# Altium PCB ScreenerMobo.PcbDoc (part 1 of 5)
Units mm, origin at the board's own origin, x right, y up, seen from the top; angles counter-clockwise.
Board outline 145 x 180 mm, 2 copper layers (Top Layer, Bottom Layer); 434 components, 355 nets, 1806 pads, 3000 vias.
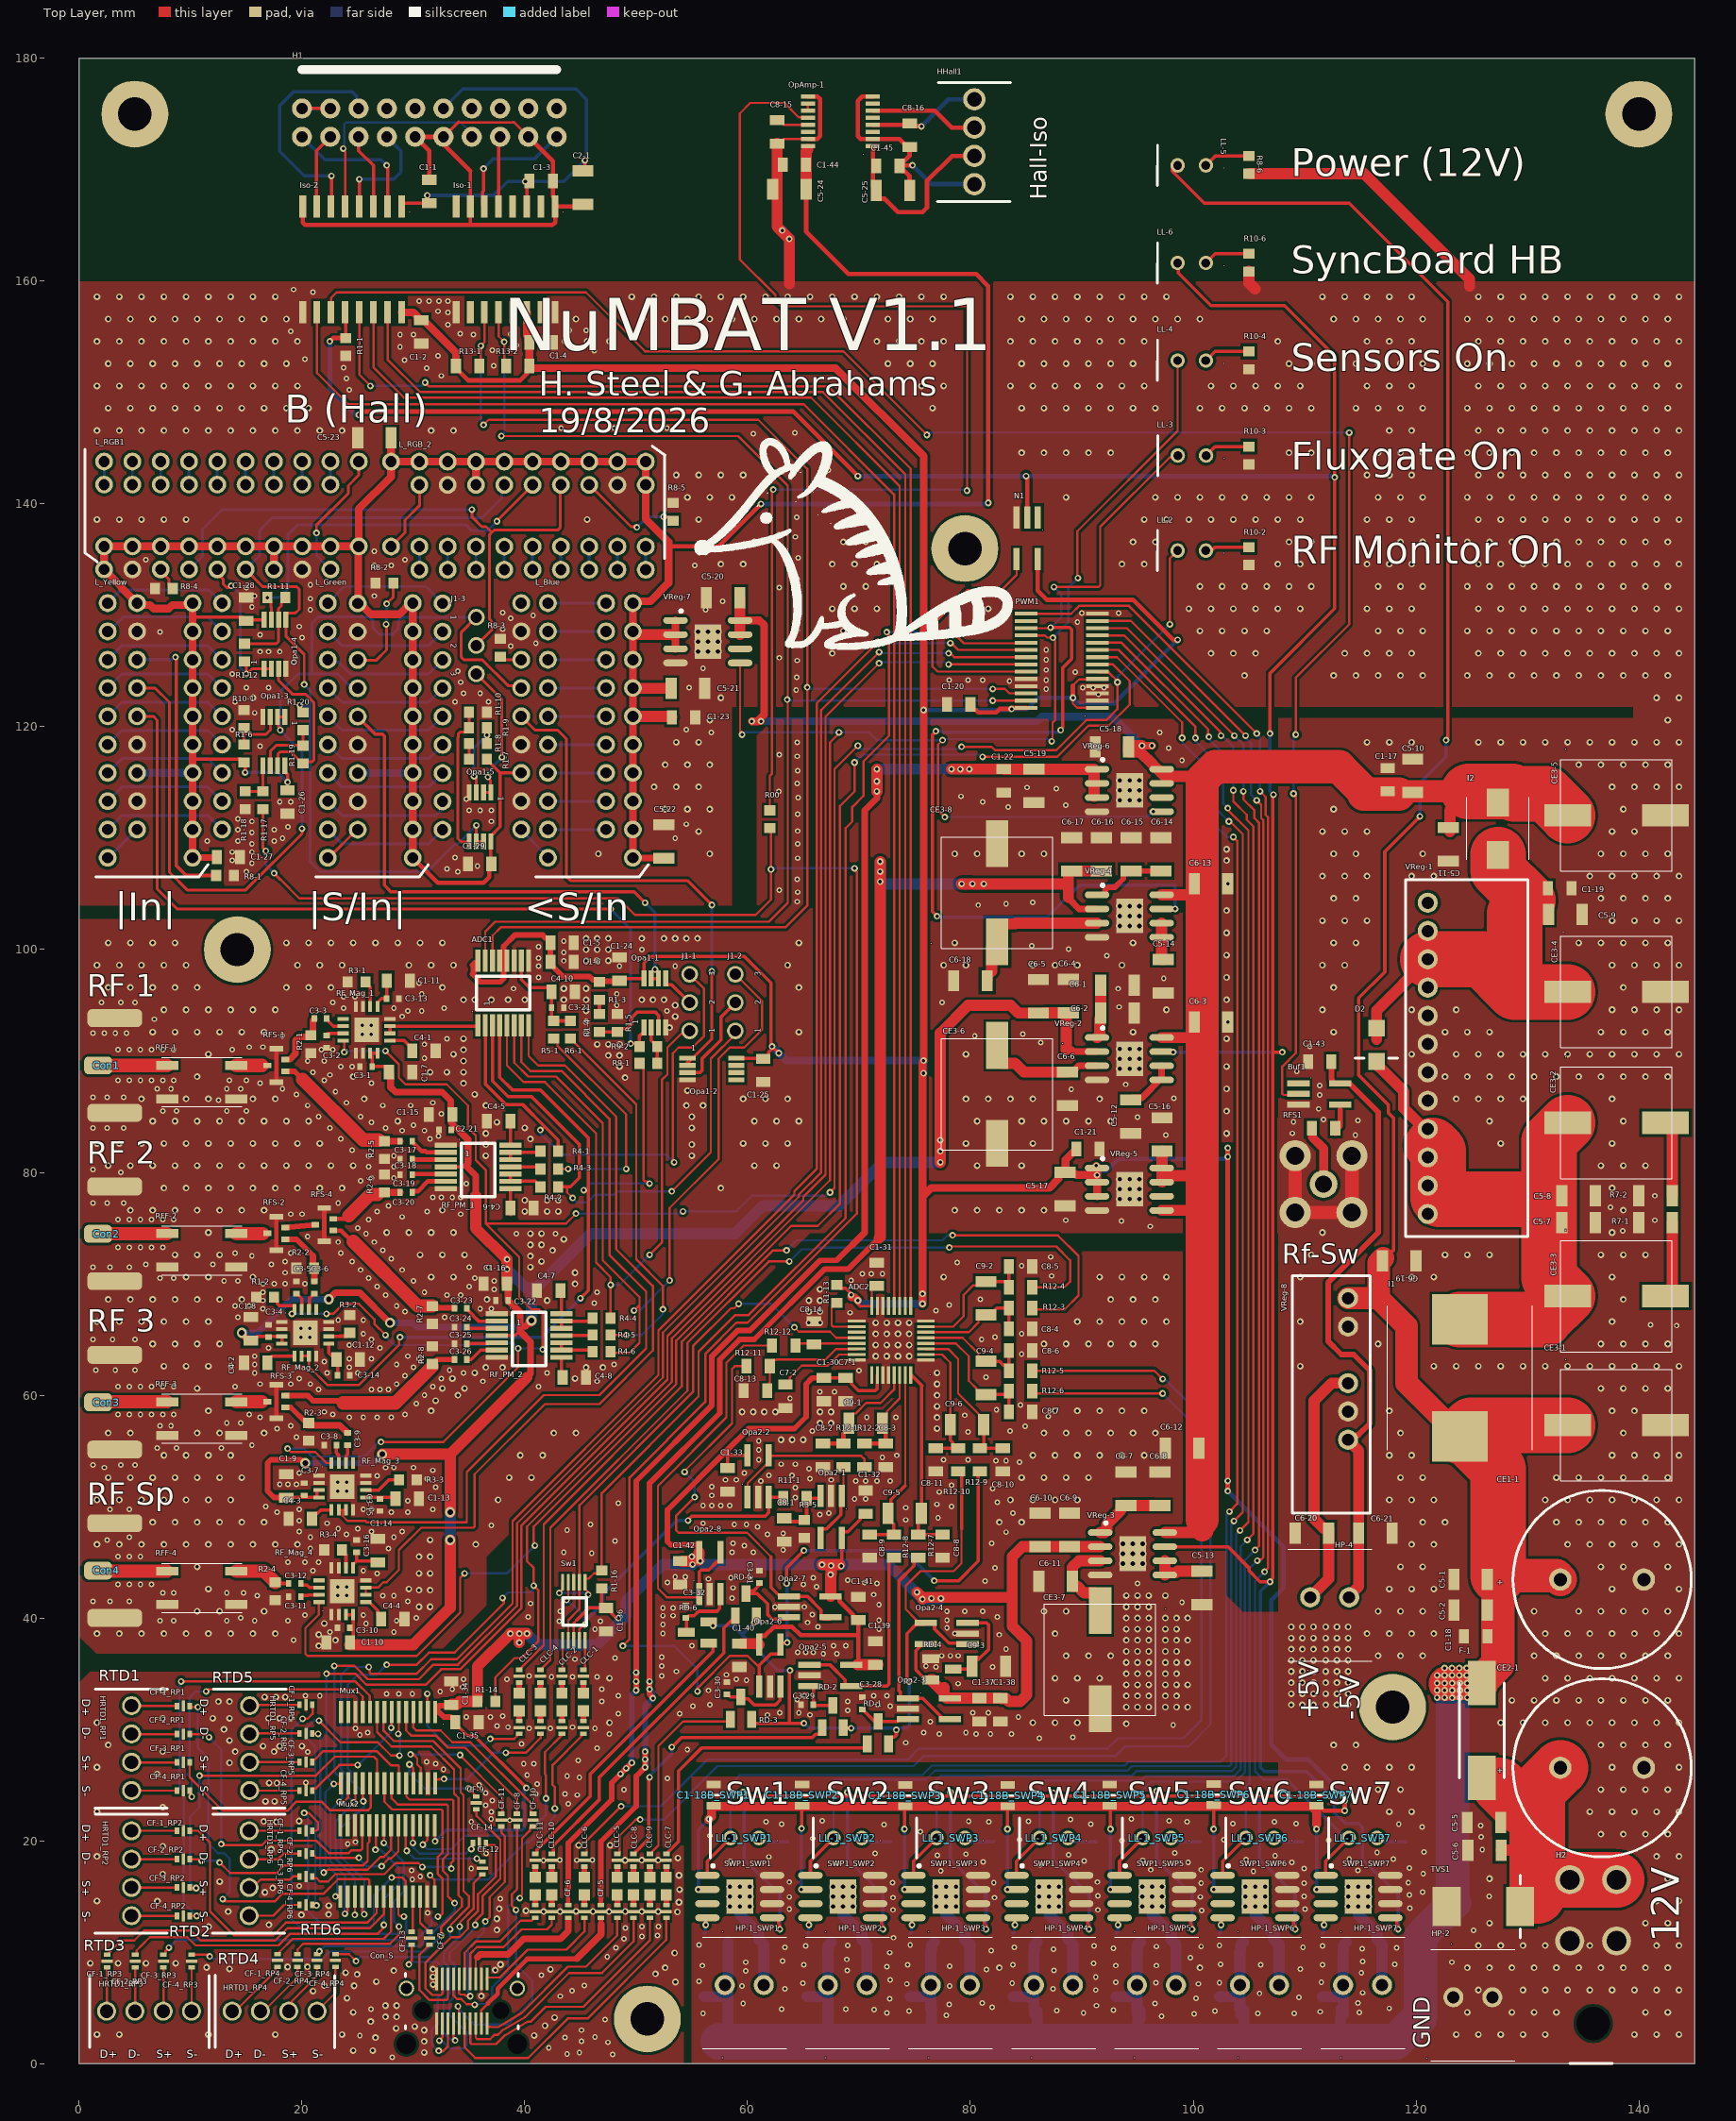
[diagram p0: Top Layer view]
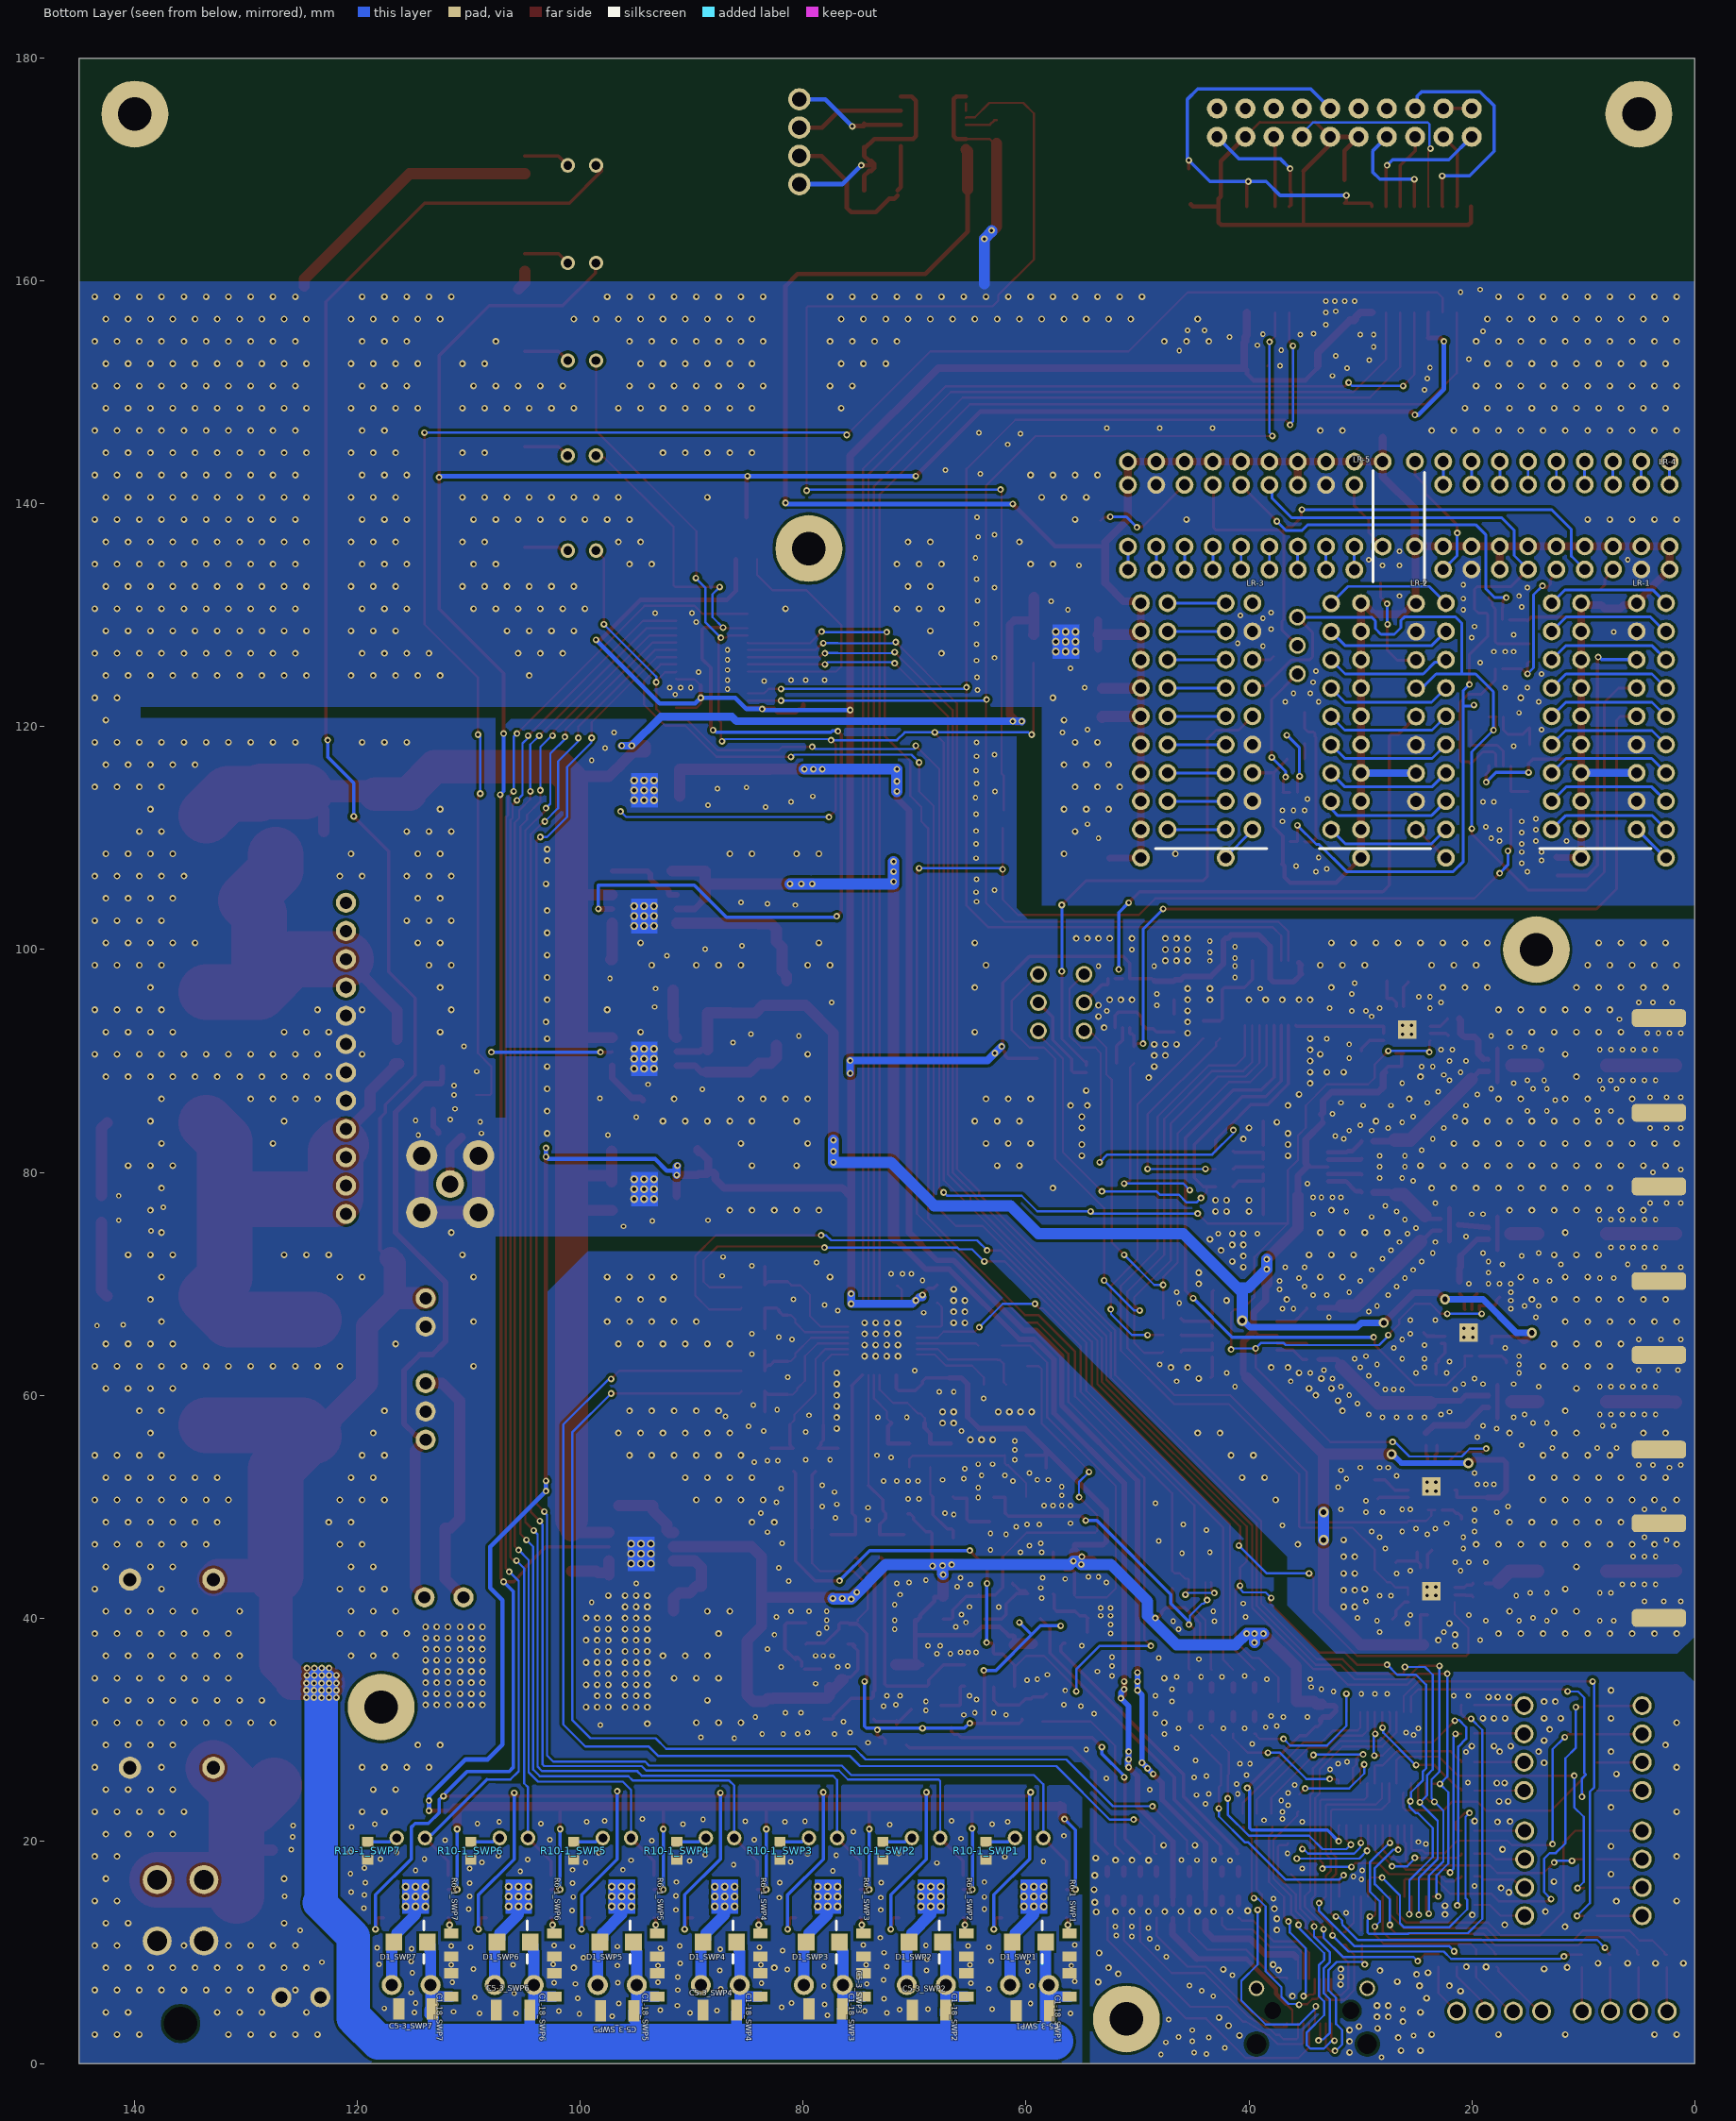
[diagram p1: Bottom Layer view, seen from below]

## Layer stack, top to bottom
Top Solder: solder mask 0.0102, Solder Resist, Dk 3.5
Top Layer: signal copper 0.0356
Dielectric 1: dielectric 0.32, FR-4, Dk 4.8
Bottom Layer: signal copper 0.0356
Bottom Solder: solder mask 0.0102, Solder Resist, Dk 3.5

## Board outline
0,0 0,180 145,180 145,0

## Design rules (kind name [scope] priority, off if disabled: settings)
Clearance [All] p1: gap=0.25 ignorepadtopadclearanceinfootprint=TRUE except(0: Arc-Text Track-Text SMDPad-Text THPad-Text Via-Text Fill-Text Poly-Text Region-Text Text-Text Text-Hole; 0.2: Arc-Arc Arc-Track Arc-SMDPad Track-Track Track-SMDPad SMDPad-SMDPad THPad-THPad)
HoleSize [All] p1: absolutevalues=TRUE maxlimit=99 minlimit=0.025 maxpercent=80.000 minpercent=20.000
MinimumSolderMaskSliver [All] p1: minsoldermaskwidth=0
PlaneConnect [All] p1: planeconnectstyle=Direct reliefexpansion=0.508 reliefentries=4 reliefconductorwidth=0.254 reliefairgap=0.254
PolygonConnect [All] p1: connectstyle=Direct reliefconductorwidth=0.5 reliefentries=4 polygonreliefangle="90 Angle" airgapwidth=0.254
RoomDefinition SWP1 [InComponentClass('SWP1')] p1: confinementstyle=ConfineIn formatcopy=TRUE lockcomponents=FALSE outline 54.95,0.15 64.2,0.15 64.2,22.35 54.95,22.35
RoomDefinition SWP6 [InComponentClass('SWP6')] p2: confinementstyle=ConfineIn formatcopy=FALSE lockcomponents=FALSE outline 101.2,0.15 110.45,0.15 110.45,22.35 101.2,22.35
RoomDefinition SWP7 [InComponentClass('SWP7')] p3: confinementstyle=ConfineIn formatcopy=FALSE lockcomponents=FALSE outline 110.45,0.15 119.7,0.15 119.7,22.35 110.45,22.35
RoomDefinition SWP5 [InComponentClass('SWP5')] p4: confinementstyle=ConfineIn formatcopy=FALSE lockcomponents=FALSE outline 91.95,0.15 101.2,0.15 101.2,22.35 91.95,22.35
RoomDefinition SWP4 [InComponentClass('SWP4')] p5: confinementstyle=ConfineIn formatcopy=FALSE lockcomponents=FALSE outline 82.7,0.15 91.95,0.15 91.95,22.35 82.7,22.35
RoomDefinition SWP2 [InComponentClass('SWP2')] p6: confinementstyle=ConfineIn formatcopy=FALSE lockcomponents=FALSE outline 64.2,0.15 73.45,0.15 73.45,22.35 64.2,22.35
RoomDefinition SWP3 [InComponentClass('SWP3')] p7: confinementstyle=ConfineIn formatcopy=FALSE lockcomponents=FALSE outline 73.45,0.15 82.7,0.15 82.7,22.35 73.45,22.35
RoutingVias [All] p1: holewidth=0.3 width=0.6 viastyle="Through Hole" minholewidth=0.3 minwidth=0.5 maxholewidth=2 maxwidth=10
SolderMaskExpansion [All] p1: expansion=0.102 istentingtop=FALSE
Width [All] p1: maxlimit=50 minlimit=0.15 preferedwidth=0.254 minimp=50.000000 maximp=50.000000 favimp=50.000000
27 further rules are at their usual default settings.

## Classes and differential pairs
channel class RTDSubsheet: RP1 RP2 RP3 RP4 RP5 RP6
channel class PowSwitchChannel: SWP1 SWP2 SWP3 SWP4 SWP5 SWP6 SWP7 SWP8
net class VRTDP[1..6]: VRTDP1 VRTDP2 VRTDP3 VRTDP4 VRTDP5 VRTDP6
net class VRTDN[1..6]: VRTDN1 VRTDN2 VRTDN3 VRTDN4 VRTDN5 VRTDN6
net class SWEN[1..7]: SWEN1 SWEN2 SWEN3 SWEN4 SWEN5 SWEN6 SWEN7
net class DRTDP[1..6]: DRTDP1 DRTDP2 DRTDP3 DRTDP4 DRTDP5 DRTDP6
net class DRTDN[1..6]: DRTDN1 DRTDN2 DRTDN3 DRTDN4 DRTDN5 DRTDN6
component class SWP7: C1-18_SWP7 C1-18B_SWP7 C5-3_SWP7 D1_SWP7 HP-1_SWP7 LL-1_SWP7 R6-1_SWP7 R10-1_SWP7 SWP1_SWP7
component class SWP6: C1-18_SWP6 C1-18B_SWP6 C5-3_SWP6 D1_SWP6 HP-1_SWP6 LL-1_SWP6 R6-1_SWP6 R10-1_SWP6 SWP1_SWP6
component class SWP5: C1-18_SWP5 C1-18B_SWP5 C5-3_SWP5 D1_SWP5 HP-1_SWP5 LL-1_SWP5 R6-1_SWP5 R10-1_SWP5 SWP1_SWP5
component class SWP4: C1-18_SWP4 C1-18B_SWP4 C5-3_SWP4 D1_SWP4 HP-1_SWP4 LL-1_SWP4 R6-1_SWP4 R10-1_SWP4 SWP1_SWP4
component class SWP3: C1-18_SWP3 C1-18B_SWP3 C5-3_SWP3 D1_SWP3 HP-1_SWP3 LL-1_SWP3 R6-1_SWP3 R10-1_SWP3 SWP1_SWP3
component class SWP2: C1-18_SWP2 C1-18B_SWP2 C5-3_SWP2 D1_SWP2 HP-1_SWP2 LL-1_SWP2 R6-1_SWP2 R10-1_SWP2 SWP1_SWP2
component class SWP1: C1-18_SWP1 C1-18B_SWP1 C5-3_SWP1 D1_SWP1 HP-1_SWP1 LL-1_SWP1 R6-1_SWP1 R10-1_SWP1 SWP1_SWP1
component class ScreenerMobo: ADC1 ADC2 Buf1 C1-1 C1-2 C1-3 C1-4 C1-5 C1-6 C1-7 C1-8 C1-9 C1-10 C1-11 C1-12 C1-13 C1-14 C1-15 C1-16 C1-17 C1-18 C1-19 C1-20 C1-21 C1-22 C1-23 C1-24 C1-25 C1-30 C1-31 C1-32 C1-33 C1-34 C1-35 C1-36 C1-43 C1-44 C1-45 C2-1 C2-21 C3-1 C3-2 C3-3 C3-4 C3-5 C3-6 C3-7 C3-8 C3-9 C3-10 C3-11 C3-12 C3-13 C3-14 C3-15 C3-16 C3-17 C3-18 C3-19 C3-20 C3-21 C3-22 C3-23 C3-24 C3-25 C3-26 C4-1 C4-2 C4-3 C4-4 C4-5 C4-6 C4-7 C4-8 C4-10 C5-1 C5-2 C5-5 C5-6 C5-7 C5-8 C5-9 C5-10 C5-11 C5-12 C5-13 C5-14 C5-16 C5-17 C5-18 C5-19 C5-20 C5-21 C5-24 C5-25 C6-1 C6-2 C6-3 C6-4 C6-5 C6-6 C6-7 C6-8 C6-9 C6-10 C6-11 C6-12 C6-13 C6-14 C6-15 C6-16 C6-17 C6-18 C6-19 C6-20 C6-21 C7-1 C7-2 C8-1 C8-2 C8-3 C8-4 C8-5 C8-6 C8-7 C8-15 C8-16 C9-1 C9-2 C9-4 CE1-1 CE2-1 CE3-1 CE3-2 CE3-3 CE3-4 CE3-5 CE3-6 CE3-7 CE3-8 CF-5 CF-6 CF-7 CF-8 CF-9 CF-10 CF-11 CF-12 CF-13 CF-14 CLC-1 CLC-2 CLC-3 CLC-4 CLC-5 CLC-6 Con1 Con2 Con3 Con4 Con_S D2 F-1 H1 H2 HHall1 HP-2 HP-4 I1 I2 Iso-1 Iso-2 J1-1 J1-2 LL-2 LL-3 LL-4 LL-5 LL-6 Mux1 Mux2 N1 Opa1-1 Opa1-2 Opa2-1 Opa2-2 OpAmp-1 PWM1 R00 R1-1 R1-2 R1-3 R1-4 R1-5 R1-13 R1-14 R1-16 R2-1 R2-2 R2-3 R2-4 R2-5 R2-6 R2-7 R2-8 R3-1 R3-2 R3-3 R3-4 R3-5 R4-1 R4-2 R4-3 R4-4 R4-5 R4-6 R5-1 R6-1 R7-1 R7-2 R8-6 R9-1 R9-2 R10-2 R10-3 R10-4 R10-6 R11-1 R12-1 R12-2 R12-3 R12-4 R12-5 R12-6 R13-1 R13-2 RF_Mag_1 RF_Mag_2 RF_Mag_3 RF_Mag_4 RF_PM_1 RF_PM_2 RFF-1 RFF-2 RFF-3 RFF-4 RFS1 RFS-1 RFS-2 RFS-3 RFS-4 Sw1 TVS1 VReg-1 VReg-2 VReg-3 VReg-4 VReg-5 VReg-6 VReg-7 VReg-8
component class RP6: CF-1_RP6 CF-2_RP6 CF-3_RP6 CF-4_RP6 HRTD1_RP6
component class RP5: CF-1_RP5 CF-2_RP5 CF-3_RP5 CF-4_RP5 HRTD1_RP5
component class RP4: CF-1_RP4 CF-2_RP4 CF-3_RP4 CF-4_RP4 HRTD1_RP4
component class RP3: CF-1_RP3 CF-2_RP3 CF-3_RP3 CF-4_RP3 HRTD1_RP3
component class RP2: CF-1_RP2 CF-2_RP2 CF-3_RP2 CF-4_RP2 HRTD1_RP2
component class RP1: CF-1_RP1 CF-2_RP1 CF-3_RP1 CF-4_RP1 HRTD1_RP1
component class LEDDisplays: C1-26 C1-27 C1-28 C1-29 C5-22 C5-23 J1-3 L_Blue L_Green L_RGB1 L_RGB_2 L_Yellow LR-1 LR-2 LR-3 LR-4 LR-5 Opa1-3 Opa1-4 Opa1-5 R1-6 R1-7 R1-8 R1-9 R1-10 R1-11 R1-12 R1-17 R1-18 R1-19 R1-20 R8-1 R8-2 R8-3 R8-4 R8-5 R10-1
component class Designator: C1-37 C1-38 C1-39 C1-40 C1-41 C1-42 C3-28 C3-29 C3-30 C3-31 C3-32 C8-8 C8-9 C8-10 C8-11 C8-13 C8-14 C9-3 C9-5 C9-6 CLC-7 CLC-8 CLC-9 CLC-10 CLC-11 Opa2-3 Opa2-4 Opa2-5 Opa2-6 Opa2-7 Opa2-8 R12-7 R12-8 R12-9 R12-10 R12-11 R12-12 RD-1 RD-2 RD-3 RD-4 RD-5 RD-6

## Components (designator, comment, footprint, x,y, rotation, side; value= is the part's Value field where it differs from the comment)
ADC1 "ADS7828" 16-TSSOP 35.8,93.2 r90 top
ADC2 "ADS124S08" 32-TQFP 76,63.15 r180 top
Buf1 "Buffer_Logic" SOT23-5 109.45,88 r0 top
C1-1 "0.1uF" 0805#1 31.42,169.1 r270 top
C1-2 "0.1uF" 0805#1 30.72,154.4 r90 top
C1-3 "0.1uF" 0805#1 42.52,169 r180 top
C1-4 "0.1uF" 0805#1 40.42,154.5 r0 top
C1-5 "0.1uF" 0805#1 42.3,100.6 r0 top
C1-6 "0.1uF" 0805#1 42.3,98.9 r0 top
C1-7 "0.1uF" 0805#1 27.8,89 r0 top
C1-8 "0.1uF" 0805#1 15.4,64.9 r90 top
C1-9 "0.1uF" 0805#1 18.6,50.8 r90 top
C1-10 "0.1uF" 0805#1 24.3,37.8 r180 top
C1-11 "0.1uF" 0805#1 29.7,97.2 r180 top
C1-12 "0.1uF" 0805#1 25.2,63.2 r180 top
C1-13 "0.1uF" 0805#1 30.5,50.7 r180 top
C1-14 "0.1uF" 0805#1 26.8,47.1 r270 top
C1-15 "0.1uF" 0805#1 33.5,85.2 r180 top
C1-16 "0.1uF" 0805#1 38.4,70 r180 top
C1-17 "0.1uF" 0805#1 117.45,116.3 r270 top
C1-18 "0.1uF" 0805#1 124.3,38.35 r0 top
C1-18_SWP1 "0.1uF" 0805#1 56.1,8.1 r270 bottom (schematic designator C1-18)
C1-18_SWP2 "0.1uF" 0805#1 65.35,8.1 r270 bottom (schematic designator C1-18)
C1-18_SWP3 "0.1uF" 0805#1 74.6,8.1 r270 bottom (schematic designator C1-18)
C1-18_SWP4 "0.1uF" 0805#1 83.85,8.1 r270 bottom (schematic designator C1-18)
C1-18_SWP5 "0.1uF" 0805#1 93.1,8.1 r270 bottom (schematic designator C1-18)
C1-18_SWP6 "0.1uF" 0805#1 102.35,8.1 r270 bottom (schematic designator C1-18)
C1-18_SWP7 "0.1uF" 0805#1 111.6,8.1 r270 bottom (schematic designator C1-18)
C1-18B_SWP1 "0.1uF" 0805#2 56.95,24.1 r90 top (schematic designator C1-18B)
C1-18B_SWP2 "0.1uF" 0805#2 64.9,24.1 r90 top (schematic designator C1-18B)
C1-18B_SWP3 "0.1uF" 0805#2 74.15,24.05 r90 top (schematic designator C1-18B)
C1-18B_SWP4 "0.1uF" 0805#2 83.35,24.05 r90 top (schematic designator C1-18B)
C1-18B_SWP5 "0.1uF" 0805#2 92.5,24.1 r90 top (schematic designator C1-18B)
C1-18B_SWP6 "0.1uF" 0805#2 101.85,24.15 r90 top (schematic designator C1-18B)
C1-18B_SWP7 "0.1uF" 0805#2 111.05,24.1 r90 top (schematic designator C1-18B)
C1-19 "0.1uF" 0805#1 133.95,105.5 r180 top
C1-20 "0.1uF" 0805#1 77.9,122 r0 top
C1-21 "0.1uF" 0805#1 91.6,82.1 r180 top
C1-22 "0.1uF" 0805#1 83,114.1 r90 top
C1-23 "0.1uF" 0805#1 55.3,120.85 r180 top
C1-24 "0.1uF" 0805#1 48.5,99.3 r270 top
C1-25 "0.1uF" 0805#1 61.4,88.1 r90 top
C1-26 "0.1uF" 0805#1 18.7,112.2 r90 top
C1-27 "0.1uF" 0805#1 12.35,108.3 r0 top
C1-28 "0.1uF" 0805#1 15,129.5 r90 top
C1-29 "0.1uF" 0805#1 37,107.7 r180 top
C1-30 "0.1uF" 0805#1 66.85,61.55 r270 top
C1-31 "0.1uF" 0805#1 71.6,69.8 r90 top
C1-32 "0.1u" 0805#1 70.6,49.35 r90 top
C1-33 "0.1u" 0805#1 58.2,53.45 r270 top
C1-34 "0.1u" 0805#1 33.4,34.3 r270 top
C1-35 "0.1u" 0805#1 35.85,30.65 r180 top
C1-36 "0.1u" 0805#1 47.3,40.9 r270 top
C1-37 "0.1u" 0805#1 80.8,30.7 r90 top
C1-38 "0.1u" 0805#1 82.7,30.7 r90 top
C1-39 "0.1u" 0805#1 71.45,37.9 r270 top
C1-40 "0.1u" 0805#1 59.25,35.6 r90 top
C1-41 "0.1u" 0805#1 69.95,41.9 r270 top
C1-42 "0.1u" 0805#1 53.95,43 r90 top
C1-43 "0.1uF" 0805#1 110.3,89.95 r0 top
C1-44 "0.1uF" 0805#1 65.25,170.45 r180 top
C1-45 "0.1uF" 0805#1 73.65,170.35 r180 top
C2-1 "10uF X7R" 1206 45.22,169.9 r270 top
C2-21 "100pF" 0402 32.3,83.8 r0 top
C3-1 "100pF" 0402 25.2,89.5 r0 top
C3-2 "100pF" 0402 22.2,91.2 r90 top
C3-3 "100pF" 0402 21.1,93.8 r0 top
C3-4 "100pF" 0402 17,66.3 r270 top
C3-5 "100pF" 0402 19.5,70.2 r270 top
C3-6 "100pF" 0402 21.1,70.2 r270 top
C3-7 "100pF" 0402 20.2,52.1 r270 top
C3-8 "100pF" 0402 22,55.5 r0 top
C3-9 "100pF" 0402 24.1,56.6 r270 top
C3-10 "100pF" 0402 23.2,39.1 r0 top
C3-11 "100pF" 0402 18.8,41.9 r0 top
C3-12 "100pF" 0402 18.8,43.1 r0 top
C3-13 "100pF" 0402 27.6,95.6 r0 top
C3-14 "100pF" 0402 23.2,61.8 r0 top
C3-15 "100pF" 0402 27,50.7 r270 top
C3-16 "100pF" 0402 24.9,45.9 r90 top
C3-17 "100pF" 0402 28.8,82.8 r0 top
C3-18 "100pF" 0402 28.8,81.2 r0 top
C3-19 "100pF" 0402 28.8,79.8 r0 top
C3-20 "100pF" 0402 28.8,78.2 r0 top
C3-21 "100pF" 0402 43.5,94.8 r180 top
C3-22 "100pF" 0402 37.4,68.5 r0 top
C3-23 "100pF" 0402 33.7,67.8 r0 top
C3-24 "100pF" 0402 33.7,66.1 r0 top
C3-25 "100pF" 0402 33.7,64.6 r0 top
C3-26 "100pF" 0402 33.7,63.2 r0 top
C3-28 "100pF" 0402 70.3,31.8 r90 top
C3-29 "100pF" 0402 65.9,32.2 r180 top
C3-30 "100pF" 0402 58.15,33.15 r90 top
C3-31 "100pF" 0402 61.05,43.15 r90 top
C3-32 "100pF" 0402 54.45,40 r90 top
C4-1 "0.47uF" 0805#1 29.9,90.9 r0 top
C4-2 "0.47uF" 0805#1 16.9,62.9 r180 top
C4-3 "0.47uF" 0805#1 20.9,48.9 r180 top
C4-4 "0.47uF" 0805#1 27.1,39.9 r0 top
C4-5 "0.47uF" 0805#1 36.6,84.6 r0 top
C4-6 "0.47uF" 0805#1 38.7,76.8 r0 top
C4-7 "0.47uF" 0805#1 41.1,69.4 r0 top
C4-8 "0.47uF" 0805#1 43.4,61.6 r0 top
C4-10 "0.47uF" 0805#1 42.4,96.2 r0 top
C5-1 "10u" 1206 123.4,43.45 r0 top
C5-2 "10u" 1206 123.4,40.702 r0 top
C5-3_SWP1 "10u" 1206 60.9,4.751 r180 bottom (schematic designator C5-3)
C5-3_SWP2 "10u" 1206 70.2,4.8 r180 bottom (schematic designator C5-3)
C5-3_SWP3 "10u" 1206 79.5,4.9 r180 bottom (schematic designator C5-3)
C5-3_SWP4 "10u" 1206 89,4.8 r180 bottom (schematic designator C5-3)
C5-3_SWP5 "10u" 1206 98.2,4.75 r180 bottom (schematic designator C5-3)
C5-3_SWP6 "10u" 1206 107.55,4.8 r180 bottom (schematic designator C5-3)
C5-3_SWP7 "10u" 1206 116.3,4.9 r180 bottom (schematic designator C5-3)
C5-5 "10u" 1206 124.6,21.65 r0 top
C5-6 "10u" 1206 124.65,19.15 r0 top
C5-7 "10u" 1206 136.1,75.5 r180 top
C5-8 "10u" 1206 136.1,77.9 r180 top
C5-9 "10u" 1206 134.9,103.15 r180 top
C5-10 "10u" 1206 119.7,117.1 r270 top
C5-11 "10u" 1206 122.9,107.95 r90 top
C5-12 "10u" 1206 94.4,83.5 r90 top
C5-13 "10u" 1206 100.8,41.2 r90 top
C5-14 "10u" 1206 97.3,99.1 r270 top
C5-16 "10u" 1206 97.2,81.9 r90 top
C5-17 "10u" 1206 88.5,80 r270 top
C5-18 "10u" 1206 94.2,118.2 r180 top
C5-19 "10u" 1206 85.7,116.2 r270 top
C5-20 "10u" 1206 59.3,131.6 r180 top
C5-21 "10u" 1206 53.15,123.45 r0 top
C5-22 "10u" 1206 52.5,111.2 r270 top
C5-23 "10u" 1206 25,145.95 r0 top
C5-24 "10u" 1206 62.25,168.25 r0 top
C5-25 "10u" 1206 71.55,168.15 r0 top
C6-1 "22uF X7R" 1206 91.7,96.8 r0 top
C6-2 "22uF X7R" 1206 91.7,94.3 r0 top
C6-3 "22uF X7R" 1206 100.1,93.5 r0 top
C6-4 "22uF X7R" 1206 88.804,97.325 r270 top
C6-5 "22uF X7R" 1206 86.1,97.3 r270 top
C6-6 "22uF X7R" 1206 88.7,86 r90 top
C6-7 "22uF X7R" 1206 93.949,50.1 r90 top
C6-8 "22uF X7R" 1206 97,50.1 r90 top
C6-9 "22uF X7R" 1206 88.9,49.4 r270 top
C6-10 "22uF X7R" 1206 86.251,49.4 r270 top
C6-11 "22uF X7R" 1206 86.15,43.3 r0 top
C6-12 "22uF X7R" 1206 100.5,55.25 r180 top
C6-13 "22u X7R" 1206 100.1,105.9 r0 top
C6-14 "22u X7R" 1206 97.1,107.05 r90 top
C6-15 "22u X7R" 1206 94.433,107.05 r90 top
C6-16 "22u X7R" 1206 91.767,110.05 r270 top
C6-17 "22u X7R" 1206 89.1,110.05 r270 top
C6-18 "22u X7R" 1206 78.5,97.2 r0 top
C6-19 "22u X7R" 1206 120,72.05 r180 top
C6-20 "22u X7R" 1206 109.15,47.6 r0 top
C6-21 "22u X7R" 1206 117.85,47.6 r180 top
C7-1 "1u" 0805#1 68.8,61.55 r270 top
C7-2 "1u" 0805#1 63.4,58.85 r90 top
C8-1 "10n NP0" 0805#1 63.3,46.85 r90 top
C8-2 "10n NP0" 0805#1 66.75,53.55 r90 top
C8-3 "10n NP0" 0805#1 72.4,53.55 r90 top
C8-4 "10n NP0" 0805#1 85.55,65.95 r180 top
C8-5 "10n NP0" 0805#1 85.55,71.55 r180 top
C8-6 "10n NP0" 0805#1 85.55,64 r180 top
C8-7 "10n NP0" 0805#1 85.55,58.5 r180 top
C8-8 "10n NP0" 0805#1 77.5,45.4 r90 top
C8-9 "10n NP0" 0805#1 70.95,45.4 r90 top
C8-10 "10n NP0" 0805#1 82.9,53.15 r90 top
C8-11 "10n NP0" 0805#1 76.9,53.15 r90 top
C8-13 "10n NP0" 0805#1 59.65,60.4 r0 top
C8-14 "10n NP0" 0805#1 65.95,66.65 r270 top
C8-15 "10n NP0" 0805#1 62.65,172.35 r90 top
C8-16 "10n NP0" 0805#1 74.55,174.15 r270 top
C9-1 "0.1u NP0" 1206 69.1,57.5 r0 top
C9-2 "0.1u NP0" 1206 81.4,67.2 r90 top
C9-3 "0.1u NP0" 1206 80.15,35.65 r0 top
C9-4 "0.1u NP0" 1206 81.4,63.05 r270 top
C9-5 "0.1u NP0" 1206 75.6,49.4 r180 top
C9-6 "0.1u NP0" 1206 81.2,57.35 r180 top
CE1-1 "1mF" CapElec 136.7,43.45 r0 top
CE2-1 "560uF" CapElec 136.7,26.55 r0 top
CE3-1 "100uF" ElectrolyticCapacitor3 138,57.3 r270 top
CE3-2 "100uF" ElectrolyticCapacitor3 138,84.45 r270 top
CE3-3 "100uF" ElectrolyticCapacitor3 138,68.9 r270 top
CE3-4 "100uF" ElectrolyticCapacitor3 138,96.2 r270 top
CE3-5 "100uF" ElectrolyticCapacitor3 138,112.05 r270 top
CE3-6 "100uF" ElectrolyticCapacitor3 82.4,87 r180 top
CE3-7 "100uF" ElectrolyticCapacitor3 91.65,36.25 r180 top
CE3-8 "100uF" ElectrolyticCapacitor3 82.4,105.1 r0 top
CF-1_RP1 "4700p" 0402-Passthrough 8.775,32.1 r0 top (schematic designator CF-1)
CF-1_RP2 "4700p" 0402-Passthrough 8.775,20.9 r0 top (schematic designator CF-1)
CF-1_RP3 "4700p" 0402-Passthrough 2.5,8.625 r90 top (schematic designator CF-1)
CF-1_RP4 "4700p" 0402-Passthrough 17.8,8.675 r90 top (schematic designator CF-1)
CF-1_RP5 "4700p" 0402-Passthrough 19.775,32.2 r0 top (schematic designator CF-1)
CF-1_RP6 "4700p" 0402-Passthrough 19.775,20.9 r0 top (schematic designator CF-1)
CF-2_RP1 "4700p" 0402-Passthrough 8.775,29.567 r0 top (schematic designator CF-2)
CF-2_RP2 "4700p" 0402-Passthrough 8.775,18.35 r0 top (schematic designator CF-2)
CF-2_RP3 "4700p" 0402-Passthrough 5.033,8.625 r90 top (schematic designator CF-2)
CF-2_RP4 "4700p" 0402-Passthrough 19.6,8.675 r90 top (schematic designator CF-2)
CF-2_RP5 "4700p" 0402-Passthrough 19.775,29.633 r0 top (schematic designator CF-2)
CF-2_RP6 "4700p" 0402-Passthrough 19.775,18.85 r0 top (schematic designator CF-2)
CF-3_RP1 "4700p" 0402-Passthrough 8.775,27.033 r0 top (schematic designator CF-3)
CF-3_RP2 "4700p" 0402-Passthrough 8.775,15.8 r0 top (schematic designator CF-3)
CF-3_RP3 "4700p" 0402-Passthrough 7.567,8.625 r90 top (schematic designator CF-3)
CF-3_RP4 "4700p" 0402-Passthrough 21.35,8.675 r90 top (schematic designator CF-3)
CF-3_RP5 "4700p" 0402-Passthrough 19.775,27.067 r0 top (schematic designator CF-3)
CF-3_RP6 "4700p" 0402-Passthrough 19.775,16.8 r0 top (schematic designator CF-3)
CF-4_RP1 "4700p" 0402-Passthrough 8.775,24.5 r0 top (schematic designator CF-4)
CF-4_RP2 "4700p" 0402-Passthrough 8.775,13.25 r0 top (schematic designator CF-4)
CF-4_RP3 "4700p" 0402-Passthrough 10.1,8.625 r90 top (schematic designator CF-4)
CF-4_RP4 "4700p" 0402-Passthrough 23,8.675 r90 top (schematic designator CF-4)
CF-4_RP5 "4700p" 0402-Passthrough 19.775,24.5 r0 top (schematic designator CF-4)
CF-4_RP6 "4700p" 0402-Passthrough 19.775,14.25 r0 top (schematic designator CF-4)
CF-5 "4700p" 0402-Passthrough 46.825,13.075 r90 top
CF-6 "4700p" 0402-Passthrough 43.887,13.075 r90 top
CF-7 "4700p" 0402-Passthrough 31.45,10.675 r90 top
CF-8 "4700p" 0402-Passthrough 39.3,21.275 r90 top
CF-9 "4700p" 0402-Passthrough 35.65,22.825 r90 top
CF-10 "4700p" 0402-Passthrough 40.75,21.275 r90 top
CF-11 "4700p" 0402-Passthrough 37.9,21.275 r90 top
CF-12 "4700p" 0402-Passthrough 36.2,16.975 r90 top
CF-13 "4700p" 0402-Passthrough 29.85,10.675 r90 top
CF-14 "4700p" 0402-Passthrough 36.5,19.8 r180 top
CLC-1 "CLC_Filter" CRCFilter 45.25,35.35 r270 top
CLC-2 "CLC_Filter" CRCFilter 43.333,35.35 r270 top
CLC-3 "CLC_Filter" CRCFilter 39.5,35.35 r270 top
CLC-4 "CLC_Filter" CRCFilter 41.417,35.35 r270 top
CLC-5 "CLC_Filter" CRCFilter 48.294,18.825 r270 top
CLC-6 "CLC_Filter" CRCFilter 45.356,18.825 r270 top
CLC-7 "CLC_Filter" CRCFilter 52.7,18.825 r270 top
CLC-8 "CLC_Filter" CRCFilter 49.762,18.825 r270 top
CLC-9 "CLC_Filter" CRCFilter 51.231,18.825 r270 top
CLC-10 "CLC_Filter" CRCFilter 42.419,18.825 r270 top
CLC-11 "CLC_Filter" CRCFilter 40.95,18.825 r270 top
Con1 "SMASide" SMA_Side 3.2,89.6 r90 top
Con2 "SMASide" SMA_Side 3.2,74.483 r90 top
Con3 "SMASide" SMA_Side 3.2,59.367 r90 top
Con4 "SMASide" SMA_Side 3.2,44.25 r90 top
Con_S "Connector_LSHM_110" Connector_LSHM_110 34.35,5.6 r180 top
D1_SWP1 "Diode_Sschottky" SOD-123F 58.25,10.9 r270 bottom (schematic designator D1)
D1_SWP2 "Diode_Sschottky" SOD-123F 67.5,10.9 r270 bottom (schematic designator D1)
D1_SWP3 "Diode_Sschottky" SOD-123F 76.75,10.9 r270 bottom (schematic designator D1)
D1_SWP4 "Diode_Sschottky" SOD-123F 86,10.9 r270 bottom (schematic designator D1)
D1_SWP5 "Diode_Sschottky" SOD-123F 95.25,10.9 r270 bottom (schematic designator D1)
D1_SWP6 "Diode_Sschottky" SOD-123F 104.5,10.9 r270 bottom (schematic designator D1)
D1_SWP7 "Diode_Sschottky" SOD-123F 113.75,10.9 r270 bottom (schematic designator D1)
D2 "Diode_Sschottky" SOD-123F 116.45,89.95 r180 top
F-1 "FerriteBead3" FerriteBead1 125.9,34.15 r270 top
H1 "Header_RA_2x10" "HeaderRA 2x10" 20,175.5 r0 top locked
H2 "HeaderPower_Molx" "Header Molex Mini-Fit Jr 5569 - duplicate" 133.8,11 r0 top
HHall1 "Header1x4" Header4x1 80.35,176.33 r270 top
HP-1_SWP1 "Header_1x2B" Header_1x2B 57.95,7.05 r0 top (schematic designator HP-1)
HP-1_SWP2 "Header_1x2B" Header_1x2B 67.2,7.05 r0 top (schematic designator HP-1)
HP-1_SWP3 "Header_1x2B" Header_1x2B 76.45,7.05 r0 top (schematic designator HP-1)
HP-1_SWP4 "Header_1x2B" Header_1x2B 85.7,7.05 r0 top (schematic designator HP-1)
HP-1_SWP5 "Header_1x2B" Header_1x2B 94.95,7.05 r0 top (schematic designator HP-1)
HP-1_SWP6 "Header_1x2B" Header_1x2B 104.2,7.05 r0 top (schematic designator HP-1)
HP-1_SWP7 "Header_1x2B" Header_1x2B 113.45,7.05 r0 top (schematic designator HP-1)
HP-2 "Header_1x2B" Header_1x2B 123.35,5.95 r0 top
HP-4 "Header_1x2B" Header_1x2B 110.5,41.85 r0 top
HRTD1_RP1 "Header1x4" Header4x1Small 4.7,32.13 r270 top (schematic designator HRTD1)
HRTD1_RP2 "Header1x4" Header4x1Small 4.7,20.89 r270 top (schematic designator HRTD1)
HRTD1_RP3 "Header1x4" Header4x1Small 2.46,4.7 r0 top (schematic designator HRTD1)
HRTD1_RP4 "Header1x4" Header4x1Small 13.73,4.7 r0 top (schematic designator HRTD1)
HRTD1_RP5 "Header1x4" Header4x1Small 15.3,32.13 r270 top (schematic designator HRTD1)
HRTD1_RP6 "Header1x4" Header4x1Small 15.25,20.89 r270 top (schematic designator HRTD1)
I1 "33uH" INDUCTOR6 123.95,61.55 r180 top
I2 "2.2uH" INDUCTOR7 127.35,110.85 r180 top
Iso-1 "Isolator_I2C" "16-SOIC Wide" 42.73,166.7 r270 top
Iso-2 "Isolator_SPI_1" "16-SOIC Wide" 28.96,166.7 r270 top
J1-1 "Jumper3" Jumper 54.8,92.7 r90 top
J1-2 "Jumper3" Jumper 58.9,92.7 r90 top
J1-3 "Jumper3" Jumper 35.65,129.84 r270 top
L_Blue "LED_Array10" 10-DIP 49.7,108.24 r180 top
L_Green "LED_Array10" 10-DIP 29.94,108.24 r180 top
L_RGB1 "LED_Array10" 10-DIP 2.24,136.192 r90 top
L_RGB_2 "LED_Array10" 10-DIP 50.86,143.8 r270 top
L_Yellow "LED_Array10" 10-DIP 10.18,108.24 r180 top
LL-1_SWP1 "LED_housed" LED_Housed 58.46,20.25 r0 top (schematic designator LL-1)
LL-1_SWP2 "LED_housed" LED_Housed 67.71,20.25 r0 top (schematic designator LL-1)
LL-1_SWP3 "LED_housed" LED_Housed 76.96,20.25 r0 top (schematic designator LL-1)
LL-1_SWP4 "LED_housed" LED_Housed 86.21,20.25 r0 top (schematic designator LL-1)
LL-1_SWP5 "LED_housed" LED_Housed 95.46,20.25 r0 top (schematic designator LL-1)
LL-1_SWP6 "LED_housed" LED_Housed 104.71,20.25 r0 top (schematic designator LL-1)
LL-1_SWP7 "LED_housed" LED_Housed 113.96,20.25 r0 top (schematic designator LL-1)
LL-2 "LED_housed" LED_Housed 98.6,135.813 r0 top
LL-3 "LED_housed" LED_Housed 98.61,144.35 r0 top
LL-4 "LED_housed" LED_Housed 98.6,152.875 r0 top
LL-5 "LED_housed" LED_Housed 98.6,170.4 r0 top
LL-6 "LED_housed" LED_Housed 98.6,161.637 r0 top
LR-1 "LM3914" 18-DIP-Sockeyt 5.2,110.78 r0 bottom
LR-2 "LM3914" 18-DIP-Sockeyt 25,110.76 r0 bottom
LR-3 "LM3914" 18-DIP-Sockeyt 39.68,110.78 r0 bottom
LR-4 "LM3915" 18-DIP-Sockeyt 22.56,134.12 r90 bottom
LR-5 "LM3915" 18-DIP-Sockeyt 30.54,141.72 r270 bottom
Mux1 "Switch_Mux8_x2" 28-TSSOP 31.95,31.55 r270 top
Mux2 "Switch_Mux8_x2" 28-TSSOP 31.9,21.4 r270 top
N1 "NOT" SOT23-5 86.05,138.8 r270 top
Opa1-1 "MCP6002" 8-MSOP 50.7,93 r90 top
Opa1-2 "MCP6002" 8-MSOP 54.6,90.25 r0 top
Opa1-3 "MCP6002" 8-MSOP 18.45,120.9 r270 top
Opa1-4 "MCP6002" 8-MSOP 16.6,125.2 r90 top
Opa1-5 "MCP6002" 8-MSOP 36.95,114.1 r270 top
Opa2-1 "Amplifier_Precision2" SOT23-5 68.45,50.95 r270 top
Opa2-2 "Amplifier_Precision2" SOT23-5 60,50.85 r90 top
Opa2-3 "Amplifier_Precision2" SOT23-5 74.4,32.8 r0 top
Opa2-4 "Amplifier_Precision2" SOT23-5 79.75,37.65 r180 top
Opa2-5 "Amplifier_Precision2" SOT23-5 65.55,35.8 r0 top
Opa2-6 "Amplifier_Precision2" SOT23-5 61.05,33.85 r90 top
Opa2-7 "Amplifier_Precision2" SOT23-5 63.7,41.95 r0 top
Opa2-8 "Amplifier_Precision2" SOT23-5 55.65,42.15 r90 top
OpAmp-1 "Amplifier_Isolator" 16-QSOP 71.25,172.14 r180 top
PWM1 "PWM28" 28-TSSOP 91.4,121.7 r180 top
R00 "0/NC" 0603 62,110.9 r90 top
R1-1 "10K" 0603 23.92,153.3 r90 top
R1-2 "10K" 0603 15.9,68.8 r0 top
R1-3 "10K" 0603 46.7,95.5 r90 top
R1-4 "10K" 0603 46.7,92.6 r90 top
R1-5 "10K" 0603 48.3,94.2 r270 top
R1-6 "10K" 0603 14.8,116.8 r90 top
R1-7 "10K" 0603 36.6,117.1 r180 top
R1-8 "10K" 0603 35,118.5 r0 top
R1-9 "10K" 0603 36.6,119.9 r180 top
R1-10 "10K" 0603 35,121.3 r0 top
R1-11 "10K" 0603 18.5,131.6 r180 top
R1-12 "10K" 0603 14.85,127.45 r270 top
R1-13 "10K" 0603 68,68.3 r90 top
R1-14 "10K" 0603 37.35,32.5 r180 top
R1-16 "10K" 0603 46.9,42.65 r90 top
R1-17 "10K" 0603 16.5,112.6 r90 top
R1-18 "10K" 0603 14.9,114.2 r270 top
R1-19 "10K" 0603 20.1,118.3 r270 top
R1-20 "10K" 0603 20.1,119.7 r90 top
R2-1 "52.3" 0603 20.8,92.3 r270 top
R2-2 "52.3" 0603 21.1,71.4 r180 top
R2-3 "52.3" 0603 20.6,57.5 r270 top
R2-4 "52.3" 0603 17.6,43.2 r270 top
R2-5 "52.3" 0603 27.4,82.8 r270 top
R2-6 "52.3" 0603 27.4,79.8 r270 top
R2-7 "52.3" 0603 31.7,68 r270 top
R2-8 "52.3" 0603 31.7,64.4 r270 top
R3-1 "499" 0603 24.1,97.1 r0 top
R3-2 "499" 0603 24.3,67.2 r270 top
R3-3 "499" 0603 30.3,52.4 r180 top
R3-4 "499" 0603 22,46.1 r0 top
R3-5 "499" 0603 65.1,47.2 r90 top
R4-1 "100" 0603 43,81.9 r180 top
R4-2 "100" 0603 43,78.7 r180 top
R4-3 "100" 0603 43,80.3 r180 top
R4-4 "100" 0603 47.7,66.9 r180 top
R4-5 "100" 0603 47.7,65.4 r180 top
R4-6 "100" 0603 47.7,63.9 r180 top
R5-1 "0" 0603 42.6,93.6 r270 top
R6-1 "NC" 0603 44.1,93.6 r270 top
R6-1_SWP1 "50k" 0805#1 56.1,11.7 r270 bottom (schematic designator R6-1)
R6-1_SWP2 "50k" 0805#1 65.35,11.7 r270 bottom (schematic designator R6-1)
R6-1_SWP3 "50k" 0805#1 74.6,11.7 r270 bottom (schematic designator R6-1)
R6-1_SWP4 "50k" 0805#1 83.85,11.7 r270 bottom (schematic designator R6-1)
R6-1_SWP5 "50k" 0805#1 93.1,11.7 r270 bottom (schematic designator R6-1)
R6-1_SWP6 "50k" 0805#1 102.35,11.7 r270 bottom (schematic designator R6-1)
R6-1_SWP7 "50k" 0805#1 111.6,11.7 r270 bottom (schematic designator R6-1)
R7-1 "1.5" 1206 143,75.5 r180 top
R7-2 "1.5" 1206 143,77.9 r180 top
R8-1 "2.49k" 0603 13.9,106.65 r180 top
R8-2 "2.49k" 0603 26.6,132.9 r0 top
R8-3 "2.49k" 0603 37.8,127.9 r270 top
R8-4 "2.49k" 0603 6.8,132.4 r0 top
R8-5 "2.49k" 0603 53.3,140.1 r270 top
R8-6 "2.49k" 0603 105,171.25 r270 top
R9-1 "499k" 0603 50.3,89.8 r0 top
R9-2 "499k" 0603 51.9,91.3 r180 top
R10-1 "5.6k" 0603 14.8,119.9 r90 top
R10-1_SWP1 "330" 0603 63.6,18.3 r90 bottom (schematic designator R10-1)
R10-1_SWP2 "330" 0603 72.85,18.3 r90 bottom (schematic designator R10-1)
R10-1_SWP3 "330" 0603 82.1,18.3 r90 bottom (schematic designator R10-1)
R10-1_SWP4 "330" 0603 91.35,18.3 r90 bottom (schematic designator R10-1)
R10-1_SWP5 "330" 0603 100.6,18.3 r90 bottom (schematic designator R10-1)
R10-1_SWP6 "330" 0603 109.85,18.3 r90 bottom (schematic designator R10-1)
R10-1_SWP7 "330" 0603 119.1,18.3 r90 bottom (schematic designator R10-1)
R10-2 "330" 0603 105,134.525 r90 top
R10-3 "330" 0603 105,143.55 r90 top
R10-4 "330" 0603 105,152.1 r90 top
R10-6 "330" 0603 105,160.875 r90 top
R11-1 "4.7k 0.01%" 0805#1 63.2,50.75 r0 top
R12-1 "1k 10ppm" 0805#1 68.6,55.65 r270 top
R12-2 "1k 10ppm" 0805#1 70.5,55.65 r270 top
R12-3 "1k 10ppm" 0805#1 83.45,67.817 r0 top
R12-4 "1k 10ppm" 0805#1 83.45,69.683 r0 top
R12-5 "1k 10ppm" 0805#1 83.45,62.2 r0 top
R12-6 "1k 10ppm" 0805#1 83.45,60.35 r0 top
R12-7 "1k 10ppm" 0805#1 75.317,47.5 r270 top
R12-8 "1k 10ppm" 0805#1 73.133,47.5 r270 top
R12-9 "1k 10ppm" 0805#1 80.85,55.25 r270 top
R12-10 "1k 10ppm" 0805#1 78.9,55.25 r270 top
R12-11 "1k 10ppm" 0805#1 62,62.6 r180 top
R12-12 "1k 10ppm" 0805#1 64.3,64.45 r180 top
R13-1 "3k3" 0805#1 33.82,152.4 r0 top
R13-2 "3k3" 0805#1 38.32,152.4 r0 top
RD-1 "100k 2ppm" SOT23-3 70.75,28.7 r90 top
RD-2 "100k 2ppm" SOT23-3 66.7,30.15 r90 top
RD-3 "100k 2ppm" SOT23-3 58.45,30.9 r90 top
RD-4 "100k 2ppm" SOT23-3 76.45,36.35 r0 top
RD-5 "100k 2ppm" SOT23-3 58.9,40.2 r90 top
RD-6 "100k 2ppm" SOT23-3 56.5,37.75 r180 top
RF_Mag_1 "AD8318" 16-LFCSP 25.8,92.8 r90 top
RF_Mag_2 "AD8318" 16-LFCSP 20.3,65.6 r0 top
RF_Mag_3 "AD8318" 16-LFCSP 23.625,51.8 r0 top
RF_Mag_4 "AD8318" 16-LFCSP 23.625,42.4 r90 top
RF_PM_1 "AD8302" 14-TSSOP 32.9,82.45 r0 top
RF_PM_2 "AD8302" 14-TSSOP 37.5,67.3 r0 top
RFF-1 "RFFilter1" RFFilter1 7.9,89.6 r0 top
RFF-2 "RFFilter1" RFFilter1 7.9,74.5 r0 top
RFF-3 "RFFilter1" RFFilter1 7.9,59.4 r0 top
RFF-4 "RFFilter1" RFFilter1 7.9,44.2 r0 top
RFS1 "SMA_Female" SMA_Ferrite 111.7,78.95 r0 top
RFS-1 "RFSplitter1" PS3216 16.9,89.6 r90 top
RFS-2 "RFSplitter1" PS3216 16.9,74.525 r90 top
RFS-3 "RFSplitter1" PS3216 16.9,59.425 r90 top
RFS-4 "RFSplitter1" PS3216 21.2,75.3 r90 top
Sw1 "Switch_Analog_2_C" 10-VSSOP 45.4,43.2 r270 top
SWP1_SWP1 "Switch_Power_2" 8-SOIC 56.39,16.894 r0 top (schematic designator SWP1)
SWP1_SWP2 "Switch_Power_2" 8-SOIC 65.64,16.894 r0 top (schematic designator SWP1)
SWP1_SWP3 "Switch_Power_2" 8-SOIC 74.89,16.894 r0 top (schematic designator SWP1)
SWP1_SWP4 "Switch_Power_2" 8-SOIC 84.14,16.894 r0 top (schematic designator SWP1)
SWP1_SWP5 "Switch_Power_2" 8-SOIC 93.39,16.894 r0 top (schematic designator SWP1)
SWP1_SWP6 "Switch_Power_2" 8-SOIC 102.64,16.894 r0 top (schematic designator SWP1)
SWP1_SWP7 "Switch_Power_2" 8-SOIC 111.89,16.894 r0 top (schematic designator SWP1)
TVS1 "TVS_Uni_13V" DO-214AB-Uni 122.75,14.1 r0 top
VReg-1 "Regulator_6V5_Switched" 12-SIP 121.05,76.27 r90 top
VReg-2 "Regulator_5V_Lownoise" 8-SOIC 91.368,92.105 r0 top
VReg-3 "Regulator_5V_Lownoise" 8-SOIC 91.65,47.67 r0 top
VReg-4 "Regulator_3V3_Lownoise" 8-SOIC 91.368,104.916 r0 top
VReg-5 "Regulator_3V3_LownoiseB" 8-SOIC 91.368,80.394 r0 top
VReg-6 "Regulator_3V3_LownoiseB" 8-SOIC 91.368,116.194 r0 top
VReg-7 "Regulator_3V3_LownoiseB" 8-SOIC 53.529,129.544 r0 top
VReg-8 "VReg_PM5" 7-SIP 113.9,68.7 r270 top

## Footprints (in the part's own frame and the unit in brackets; to place one, negate y for a bottom-side part, rotate by r counter-clockwise, add the part's x,y. Pads: shape width x height; smd on the part's side, far side on the other; paste and mask are expansions set on the pad)
7-SIP [mm]
  round 1.8 hole 1.1 mask+0.15: 1(0,0) 2(2.54,0) 4(7.62,0) 5(10.16,0) 6(12.7,0)
  silkscreen extent -2.02,-5 19.3,2
8-MSOP [mm]
  rect 1.45x0.45 smd: 1(0,0) 2(0,-0.65) 3(0,-1.3) 4(0,-1.95) 5(4.4,-1.95) 6(4.4,-1.3) 7(4.4,-0.65) 8(4.4,0)
8-SOIC [mm]
  round 0.7 hole 0.4 mask+0.05: 0(2.032,-2.794) 0(2.032,-1.905) 0(2.032,-1.016) 0(2.921,-2.794) 0(2.921,-1.905) 0(2.921,-1.016) 0(3.81,-2.794) 0(3.81,-1.905) 0(3.81,-1.016)
  rect 2.4x3.1 smd mask+0.05: 0(2.921,-1.905)
  oval 2.2x0.6 smd: 1(0,0) 2(0,-1.27) 3(0,-2.54) 4(0,-3.81) 5(5.8,-3.81) 6(5.8,-2.54) 7(5.8,-1.27) 8(5.8,0)
  Bottom Layer region: 1.7,-3.456 4.1,-3.456 4.1,-0.356 1.7,-0.356
  silkscreen extent 0.38,0.73 0.63,0.97, body extent 0.9,-4.41 4.9,0.6, height 1.75
10-DIP [mm]
  round 1.6 hole 1 mask+0.15: 1(0,0) 2(0,-2.54) 3(0,-5.08) 4(0,-7.62) 5(0,-10.16) 6(0,-12.7) 7(0,-15.24) 8(0,-17.78) 9(0,-20.32) 10(0,-22.86) 11(7.62,-22.86) 12(7.62,-20.32) 13(7.62,-17.78) 14(7.62,-15.24) 15(7.62,-12.7) 16(7.62,-10.16) 17(7.62,-7.62) 18(7.62,-5.08) 19(7.62,-2.54) 20(7.62,0)
  silkscreen extent -1.39,0.6 8.7,1.72
10-VSSOP [mm]
  rect 1.5x0.28 smd: 1(0,0) 2(0,-0.5) 3(0,-1) 4(0,-1.5) 5(0,-2) 6(5.2,-2) 7(5.2,-1.5) 8(5.2,-1) 9(5.2,-0.5) 10(5.2,0)
  silkscreen extent 1.4,-1.98 3.84,0.15
12-SIP [mm]
  round 1.8 hole 1.1 mask+0.15: 1(0,0) 2(2.54,0) 3(5.08,0) 4(7.62,0) 5(10.16,0) 6(12.7,0) 7(15.24,0) 8(17.78,0) 9(20.32,0) 10(22.86,0) 11(25.4,0) 12(27.94,0)
  silkscreen extent -2.02,-9 29.98,2
14-TSSOP [mm]
  rect 2x0.45 smd mask+0.02: 1(0,0) 2(0,-0.65) 3(0,-1.3) 4(0,-1.95) 5(0,-2.6) 6(0,-3.25) 7(0,-3.9) 8(5.8,-3.9) 9(5.8,-3.25) 10(5.8,-2.6) 11(5.8,-1.95) 12(5.8,-1.3) 13(5.8,-0.65) 14(5.8,0)
  silkscreen extent 1.4,-4.65 4.4,0.15
16-LFCSP [mm]
  rect 1x0.35 smd mask+0.05: 1(-2.1,0.975) 2(-2.1,0.325) 3(-2.1,-0.325) 4(-2.1,-0.975) 9(2.1,-0.975) 10(2.1,-0.325) 11(2.1,0.325) 12(2.1,0.975)
  rect 0.35x1 smd mask+0.05: 5(-0.975,-2.1) 6(-0.325,-2.1) 7(0.325,-2.1) 8(0.975,-2.1) 13(0.975,2.1) 14(0.325,2.1) 15(-0.325,2.1) 16(-0.975,2.1)
  round 0.7 hole 0.3 mask+0.05: 17(-0.4,0.4) 17(-0.4,-0.4) 17(0.4,0.4) 17(0.4,-0.4)
  rect 2.2x2.2 smd mask+0.05: 17(0,0)
  rect 1.65x1.65 smd far side mask+0.05: 17(0,0)
16-QSOP [mil]
  rect 50x15 smd mask+1.97: 1(0,0) 2(0,-25) 3(0,-50) 4(0,-75) 5(0,-100) 6(0,-125) 7(0,-150) 8(0,-175) 9(230,-175) 10(230,-150) 11(230,-125) 12(230,-100) 13(230,-75) 14(230,-50) 15(230,-25) 16(230,0)
"16-SOIC Wide" [mm]
  rect 2x0.6 smd mask+0.05: 1(0,0) 2(0,-1.27) 3(0,-2.54) 4(0,-3.81) 5(0,-5.08) 6(0,-6.35) 7(0,-7.62) 8(0,-8.89) 9(9.5,-8.89) 10(9.5,-7.62) 11(9.5,-6.35) 12(9.5,-5.08) 13(9.5,-3.81) 14(9.5,-2.54) 15(9.5,-1.27) 16(9.5,0)
16-TSSOP [mm]
  rect 2x0.45 smd mask+0.02: 1(0,0) 2(0,-0.65) 3(0,-1.3) 4(0,-1.95) 5(0,-2.6) 6(0,-3.25) 7(0,-3.9) 8(0,-4.55) 9(5.8,-4.55) 10(5.8,-3.9) 11(5.8,-3.25) 12(5.8,-2.6) 13(5.8,-1.95) 14(5.8,-1.3) 15(5.8,-0.65) 16(5.8,0)
  silkscreen extent 1.4,-4.65 4.4,0.15
18-DIP-Sockeyt [mm]
  round 1.6 hole 1 mask+0.15: 1(0,0) 2(0,-2.54) 3(0,-5.08) 4(0,-7.62) 5(0,-10.16) 6(0,-12.7) 7(0,-15.24) 8(0,-17.78) 9(0,-20.32) 10(7.62,-20.32) 11(7.62,-17.78) 12(7.62,-15.24) 13(7.62,-12.7) 14(7.62,-10.16) 15(7.62,-7.62) 16(7.62,-5.08) 17(7.62,-2.54) 18(7.62,0)
  silkscreen extent -1.3,1.7 8.7,1.7
28-TSSOP [mm]
  rect 2x0.35 smd mask+0.05: 1(0,0) 2(0,-0.65) 3(0,-1.3) 4(0,-1.95) 5(0,-2.6) 6(0,-3.25) 7(0,-3.9) 8(0,-4.55) 9(0,-5.2) 10(0,-5.85) 11(0,-6.5) 12(0,-7.15) 13(0,-7.8) 14(0,-8.45) 15(6.4,-8.45) 16(6.4,-7.8) 17(6.4,-7.15) 18(6.4,-6.5) 19(6.4,-5.85) 20(6.4,-5.2) 21(6.4,-4.55) 22(6.4,-3.9) 23(6.4,-3.25) 24(6.4,-2.6) 25(6.4,-1.95) 26(6.4,-1.3) 27(6.4,-0.65) 28(6.4,0)
32-TQFP [mm]
  rect 1.6x0.28 smd mask+0.051: 1(0,0) 2(0,-0.5) 3(0,-1) 4(0,-1.5) 5(0,-2) 6(0,-2.5) 7(0,-3) 8(0,-3.5) 17(6.2,-3.5) 18(6.2,-3) 19(6.2,-2.5) 20(6.2,-2) 21(6.2,-1.5) 22(6.2,-1) 23(6.2,-0.5) 24(6.2,0)
  rect 0.28x1.6 smd mask+0.051: 9(1.35,-4.85) 10(1.85,-4.85) 11(2.35,-4.85) 12(2.85,-4.85) 13(3.35,-4.85) 14(3.85,-4.85) 15(4.35,-4.85) 16(4.85,-4.85) 25(4.85,1.35) 26(4.35,1.35) 27(3.85,1.35) 28(3.35,1.35) 29(2.85,1.35) 30(2.35,1.35) 31(1.85,1.35) 32(1.35,1.35)
0402 [mm]
  rect 0.5x0.6 smd mask+0.05: 1(0,0) 2(1.1,0)
0402-Passthrough [mm]
  rect 0.4x0.6 smd mask+0.05: 1(0,0) 2(1.15,0)
  rect 0.3x1 smd mask+0.05: 3(0.575,0)
0603 [mm]
  rect 0.9x1 smd mask+0.05: 1(0,0) 2(1.6,0)
0805#1 [mm]
  rect 0.9x1.3 smd: 1(2.1,0) 2(0,0)
0805#2 [mm] "Chip Resistor, Body 2.0x1.2mm, IPC High Density"
  rect 0.7x1.3 smd: 1(-0.95,0) 2(0.95,0)
  silkscreen extent 0,-0.55 0,0.55, body extent -1.07,-0.7 1.07,0.7, height 0.7
1206 [mm]
  rect 1x1.9 smd mask+0.05: 1(0,0) 2(3,0)
CapElec [mm]
  round 2 hole 1.2 mask+0.05: 1(-3.75,0) 2(3.75,0)
  silkscreen extent -8,-8 8,8
Connector_LSHM_110 [mm]
  round 1.4 hole 1 mask+0.15: 0(-4.975,-1.15) 0(4.975,-1.15)
  round 1 hole 1.5 unplated mask+0.15: 0(-3.5,0.85) 0(3.5,0.85)
  rect 0.25x2 smd mask+0.15: 1(-2.25,2) 2(-2.25,-2) 3(-1.75,2) 4(-1.75,-2) 5(-1.25,2) 6(-1.25,-2) 7(-0.75,2) 8(-0.75,-2) 9(-0.25,2) 10(-0.25,-2) 11(0.25,2) 12(0.25,-2) 13(0.75,2) 14(0.75,-2) 15(1.25,2) 16(1.25,-2) 17(1.75,2) 18(1.75,-2) 19(2.25,2) 20(2.25,-2)
  silkscreen extent -5.07,-2.5 5.07,2.5
CRCFilter [mm]
  rect 0.4x0.6 smd mask+0.05: 0(1.15,0) 0(4.6,0) 1(0,0) 2(5.75,0)
  rect 1x1 smd mask+0.05: 0(2.1,0) 0(3.7,0)
  rect 0.3x1 smd mask+0.05: 3(0.575,0) 3(5.175,0)
  Top Layer lines w0.5: 4.525,0 3.875,0 ; 1.9,0 1.25,0
DO-214AB-Uni [mm]
  rect 2.5x3.5 smd mask+0.05: 1(0,0) 2(6.6,0)
  silkscreen extent 6.6,-2.8 6.6,2.8
ElectrolyticCapacitor3 [mm]
  rect 2x4.2 smd: 1(0,-4.4) 2(0,4.4)
  silkscreen extent -5,-5 5,5
FerriteBead1 [mm]
  rect 4x2.5 smd mask+0.05: 1(0,0) 2(8.5,0)
  silkscreen extent 0,-2 8.5,2
Header4x1 [mm]
  round 2 hole 1.3 mask+0.15: 1(0,0) 2(2.54,0) 3(5.08,0) 4(7.62,0)
  silkscreen extent -1.5,-3.3 9.2,3.25
Header4x1Small [mm]
  round 1.7 hole 1.2 mask+0.15: 1(0,0) 2(2.54,0) 3(5.08,0) 4(7.62,0)
  silkscreen extent -1.5,-3.3 9.2,3.25
"Header Molex Mini-Fit Jr 5569 - duplicate" [mm]
  round 2.6 hole 1.8 mask+0.05: 1(0,0) 2(4.2,0) 3(0,5.5) 4(4.2,5.5)
  round 0 hole 3 unplated mask+0.05: 5(2.1,-7.4)
  silkscreen extent 0,-11 3.81,-11
Header_1x2B [mm]
  round 1.8 hole 1.1 mask+0.05: 1(0,0) 2(3.5,0)
  silkscreen extent -2,-5.7 5.54,4.3
"HeaderRA 2x10" [mm]
  round 1.8 hole 1 mask+0.05: 1(0,0) 2(2.54,0) 3(5.08,0) 4(7.62,0) 5(10.16,0) 6(12.7,0) 7(15.24,0) 8(17.78,0) 9(20.32,0) 10(22.86,0) 11(22.86,-2.54) 12(20.32,-2.54) 13(17.78,-2.54) 14(15.24,-2.54) 15(12.7,-2.54) 16(10.16,-2.54) 17(7.62,-2.54) 18(5.08,-2.54) 19(2.54,-2.54) 20(0,-2.54)
  silkscreen extent 0,3.5 22.86,3.5
INDUCTOR6 [mm]
  rect 5x4.5 smd: 1(0,5.25) 2(0,-5.25)
  silkscreen extent -6.5,-6.5 6.5,6.5
INDUCTOR7 [mm]
  rect 2x2.5 smd: 1(0,2.35) 2(0,-2.35)
  silkscreen extent -2.8,-2.8 2.8,2.8
Jumper [mm]
  round 1.5 hole 1.02 mask+0.05: 1(0,0) 2(2.54,0) 3(5.08,0)
LED_Housed [mm]
  round 1.3 hole 0.8 mask+0.15: 1(0,0) 2(2.54,0)
  silkscreen extent -1.81,-1.8 -1.8,1.8
PS3216 [mm]
  rect 0.5x0.7 smd mask+0.15: 1(0,0) 2(-0.525,-1.6) 3(0.525,-1.6)
  rect 0.5x1.2 smd mask+0.15: 4(-1.5,-0.8) 4(1.5,-0.8)
  Top Layer lines w0.4: -1.5,-0.8 1.5,-0.8
RFFilter1 [mm]
  rect 2x0.8 smd mask+0.15: 1(0,0) 2(0,-3) 3(6.2,-3) 4(6.2,0)
  silkscreen extent -0.5,-3.7 6.7,0.7
SMA_Ferrite [mm]
  rect 0.9x1.3 smd: 0(-1.05,5) 1(1.05,5)
  round 2.5 hole 1.5 mask+0.05: 0(0,0)
  round 2.8 hole 1.6 mask+0.05: 2(-2.55,-2.55) 2(-2.55,2.55) 2(2.55,-2.55) 2(2.55,2.55)
  Top Layer lines w0.8: -1,4.2 0,3.2 0,0
  Top Layer lines w1.2: -2.55,2.55 -2.55,-2.55 2.55,-2.55 2.55,2.55
SMA_Side [mm]
  rrect50% 1.6x2.5 smd paste+0: 1(0,1.5)
  rrect50% 1.6x4.9 smd paste+0: 2(-4.25,0) 2(4.25,0)
  rrect50% 1.6x4.9 smd far side paste+0: 2(-4.25,0) 2(4.25,0)
SOD-123F [mm]
  rect 1.5x1.5 smd mask+0.15: 1(0,0) 2(0,-3)
  silkscreen extent -1.9,-0.3 1.9,-0.3
SOT23-3 [mm]
  rect 1.5x0.8 smd mask+0.02: 1(0,0) 2(0,-1.9) 3(2,-0.95)
SOT23-5 [mm]
  rect 2x0.55 smd mask+0.051: 1(0,0) 2(0,-0.95) 3(0,-1.9) 4(3.75,-1.9) 5(3.75,0)

## Part data
ADC2: Case/Package=TQFP, Manufacturer="Texas Instruments", Manufacturer Part Number=ADS124S08IPBSR, Category="Analog to Digital Converters (ADCs)", Digikey P/N=296-45170-1-ND, Height=1.2mm, Interface=SPI
C1-1 C1-2 C1-3 C1-4 C1-5 C1-6 C1-7 C1-8 C1-9 C1-10 C1-11 C1-12 C1-13 C1-14 C1-15 C1-16 C1-17 C1-18 C1-18_SWP1 C1-18_SWP2 C1-18_SWP3 C1-18_SWP4 C1-18_SWP5 C1-18_SWP6 C1-18_SWP7 C1-18B_SWP1 C1-18B_SWP2 C1-18B_SWP3 C1-18B_SWP4 C1-18B_SWP5 C1-18B_SWP6 C1-18B_SWP7 C1-19 C1-20 C1-21 C1-22 C1-23 C1-24 C1-25 C1-26 C1-27 C1-28 C1-29 C1-30 C1-31 C1-32 C1-33 C1-34 C1-35 C1-36 C1-37 C1-38 C1-39 C1-40 C1-41 C1-42 C1-43 C1-44 C1-45 C2-21 C3-1 C3-2 C3-3 C3-4 C3-5 C3-6 C3-7 C3-8 C3-9 C3-10 C3-11 C3-12 C3-13 C3-14 C3-15 C3-16 C3-17 C3-18 C3-19 C3-20 C3-21 C3-22 C3-23 C3-24 C3-25 C3-26 C3-28 C3-29 C3-30 C3-31 C3-32 C4-1 C4-2 C4-3 C4-4 C4-5 C4-6 C4-7 C4-8 C4-10 C9-1 C9-2 C9-3 C9-4 C9-5 C9-6: library part Capacitor1
  C1-32 C1-33 C1-34 C1-35 C1-36 C1-37 C1-38 C1-39 C1-40 C1-41 C1-42: Digikey P/N=311-1140-1-ND
  C2-21 C3-1 C3-2 C3-3 C3-4 C3-5 C3-6 C3-7 C3-8 C3-9 C3-10 C3-11 C3-12 C3-13 C3-14 C3-15 C3-16 C3-17 C3-18 C3-19 C3-20 C3-21 C3-22 C3-23 C3-24 C3-25 C3-26 C3-28 C3-29 C3-30 C3-31 C3-32: Digikey P/N=399-11246-1-ND
  C4-1 C4-2 C4-3 C4-4 C4-5 C4-6 C4-7 C4-8 C4-10: Digikey P/N=478-KGM21AR71E474JUCT-ND
  C9-1 C9-2 C9-3 C9-4 C9-5 C9-6: Digikey P/N=490-GRT31C5C1H104FA02LCT-ND
C2-1 C6-1 C6-2 C6-3 C6-4 C6-5 C6-6 C6-7 C6-8 C6-9 C6-10 C6-11 C6-12 C6-13 C6-14 C6-15 C6-16 C6-17 C6-18 C6-19 C6-20 C6-21: library part "Cap 0805", "Capacitor"
  C2-1: Digikey P/N=587-3485-1-ND
  C6-1 C6-2 C6-3 C6-4 C6-5 C6-6 C6-7 C6-8 C6-9 C6-10 C6-11 C6-12 C6-13 C6-14 C6-15 C6-16 C6-17 C6-18 C6-19 C6-20 C6-21: Digikey P/N=490-14439-1-ND
C5-1 C5-2 C5-3_SWP1 C5-3_SWP2 C5-3_SWP3 C5-3_SWP4 C5-3_SWP5 C5-3_SWP6 C5-3_SWP7 C5-5 C5-6 C5-7 C5-8 C5-9 C5-10 C5-11 C5-12 C5-13 C5-14 C5-16 C5-17 C5-18 C5-19 C5-20 C5-21 C5-22 C5-23 C5-24 C5-25 C7-1 C7-2 C8-1 C8-2 C8-3 C8-4 C8-5 C8-6 C8-7 C8-8 C8-9 C8-10 C8-11 C8-13 C8-14 C8-15 C8-16: library part Capacitor1205
  C5-1 C5-2 C5-3_SWP1 C5-3_SWP2 C5-3_SWP3 C5-3_SWP4 C5-3_SWP5 C5-3_SWP6 C5-3_SWP7 C5-5 C5-6 C5-7 C5-8 C5-9 C5-10 C5-11 C5-12 C5-13 C5-14 C5-16 C5-17 C5-18 C5-19 C5-20 C5-21 C5-22 C5-23 C5-24 C5-25: Digikey P/N=1276-6767-1-ND
  C7-1 C7-2: Digikey P/N=1276-1066-1-ND
  C8-1 C8-2 C8-3 C8-4 C8-5 C8-6 C8-7 C8-8 C8-9 C8-10 C8-11 C8-13 C8-14 C8-15 C8-16: Digikey P/N=490-1642-1-ND
CE1-1 CE2-1: library part CapElectrolytic
  CE1-1: Digikey P/N=732-9249-1-ND
  CE2-1: Digikey P/N=565-3414-ND
CE3-1 CE3-2 CE3-3 CE3-4 CE3-5 CE3-6 CE3-7 CE3-8: library part CapElectrolytic_LowESR, Digikey P/N=493-6454-1-ND
CF-1_RP1 CF-1_RP2 CF-1_RP3 CF-1_RP4 CF-1_RP5 CF-1_RP6 CF-2_RP1 CF-2_RP2 CF-2_RP3 CF-2_RP4 CF-2_RP5 CF-2_RP6 CF-3_RP1 CF-3_RP2 CF-3_RP3 CF-3_RP4 CF-3_RP5 CF-3_RP6 CF-4_RP1 CF-4_RP2 CF-4_RP3 CF-4_RP4 CF-4_RP5 CF-4_RP6 CF-5 CF-6 CF-7 CF-8 CF-9 CF-10 CF-11 CF-12 CF-13 CF-14: library part CapFeedthrough, Digikey P/N=709-EMCF500W472M1GV001TCT-ND
I1: library part Inductor6, Digikey P/N=732-3881-1-ND
I2: library part Inductor7, Digikey P/N=732-6179-1-ND
LR-4 LR-5: library part LM3914, Digikey P/N=1175-1489-ND
PWM1: "PWM", Digikey P/N=568-11925-1-ND
R00 R1-1 R1-2 R1-3 R1-4 R1-5 R1-6 R1-7 R1-8 R1-9 R1-10 R1-11 R1-12 R1-13 R1-14 R1-16 R1-17 R1-18 R1-19 R1-20 R2-1 R2-2 R2-3 R2-4 R2-5 R2-6 R2-7 R2-8 R3-1 R3-2 R3-3 R3-4 R3-5 R4-1 R4-2 R4-3 R4-4 R4-5 R4-6 R5-1 R6-1 R6-1_SWP1 R6-1_SWP2 R6-1_SWP3 R6-1_SWP4 R6-1_SWP5 R6-1_SWP6 R6-1_SWP7 R7-1 R7-2 R8-1 R8-2 R8-3 R8-4 R8-5 R8-6 R9-1 R9-2 R10-1 R10-1_SWP1 R10-1_SWP2 R10-1_SWP3 R10-1_SWP4 R10-1_SWP5 R10-1_SWP6 R10-1_SWP7 R10-2 R10-3 R10-4 R10-6 R11-1: library part Res1, "Resistor"
  R00 R1-1 R1-2 R1-3 R1-4 R1-5 R1-6 R1-7 R1-8 R1-9 R1-10 R1-11 R1-12 R1-13 R1-14 R1-16 R1-17 R1-18 R1-19 R1-20: Digikey P/N=311-10.0KHRCT-ND, FP="0603 (1608 Metric)"
  R2-1 R2-2 R2-3 R2-4 R2-5 R2-6 R2-7 R2-8 R6-1: Digikey P/N=A127196CT-ND, FP="0603 (1608 Metric)"
  R3-1 R3-2 R3-3 R3-4 R3-5: Digikey P/N=A139814CT-ND, FP="0603 (1608 Metric)"
  R4-1 R4-2 R4-3 R4-4 R4-5 R4-6: Digikey P/N=TNP100AACT-ND, FP="0603 (1608 Metric)"
  R5-1: FP="0603 (1608 Metric)"
  R6-1_SWP1 R6-1_SWP2 R6-1_SWP3 R6-1_SWP4 R6-1_SWP5 R6-1_SWP6 R6-1_SWP7: Digikey P/N=311-49.9KCRCT-ND
  R7-1 R7-2: Digikey P/N=2019-SG73P2BTTD1R50FCT-ND
  R8-1 R8-2 R8-3 R8-4 R8-5 R8-6: Digikey P/N=P2.49KDBCT-ND, FP="0603 (1608 Metric)"
  R9-1 R9-2: Digikey P/N=YAG4565CT-ND, FP="0603 (1608 Metric)"
  R10-1: Digikey P/N=RG16P5.6KBCT-ND, FP="0603 (1608 Metric)"
  R10-1_SWP1 R10-1_SWP2 R10-1_SWP3 R10-1_SWP4 R10-1_SWP5 R10-1_SWP6 R10-1_SWP7 R10-2 R10-3 R10-4 R10-6: Digikey P/N=311-330HRCT-ND
  R11-1: Digikey P/N=408-1642-1-ND, FP="0603 (1608 Metric)"
R12-1 R12-2 R12-3 R12-4 R12-5 R12-6 R12-7 R12-8 R12-9 R12-10 R12-11 R12-12 R13-1 R13-2: library part Res1
  R12-1 R12-2 R12-3 R12-4 R12-5 R12-6 R12-7 R12-8 R12-9 R12-10 R12-11 R12-12: Digikey P/N=A140905CT-ND
RD-1 RD-2 RD-3 RD-4 RD-5 RD-6: library part Res_Divider4, Digikey P/N=764-MPMT2003AT5CT-ND
TVS1: library part TVS_Uni_24V, Digikey P/N=SMCJ13ABCT-ND
ADC1: Digikey P/N=296-24101-1-ND
Buf1: Digikey P/N=296-17893-1-ND
CLC-1 CLC-2 CLC-3 CLC-4 CLC-5 CLC-6 CLC-7 CLC-8 CLC-9 CLC-10 CLC-11: Digikey P/N="709-EMCF500W472M1GV001TCT-ND, 240-2559-1-ND"
Con1 Con2 Con3 Con4: Digikey P/N=ARF1744-ND
Con_S: Digikey P/N=SAM15998CT-ND
D1_SWP1 D1_SWP2 D1_SWP3 D1_SWP4 D1_SWP5 D1_SWP6 D1_SWP7 D2: Digikey P/N=RBR3MM30ATFCT-ND
F-1: Digikey P/N=732-2394-1-ND
H1: Digikey P/N="SAM8104-ND, SAM8089-ND"
H2: Digikey P/N="WM23323-ND, 1470-4869-ND"
HHall1 HRTD1_RP1 HRTD1_RP2 HRTD1_RP3 HRTD1_RP4 HRTD1_RP5 HRTD1_RP6: Digikey P/N=ED10563-ND
HP-1_SWP1 HP-1_SWP2 HP-1_SWP3 HP-1_SWP4 HP-1_SWP5 HP-1_SWP6 HP-1_SWP7 HP-2 HP-4: Digikey P/N=277-5924-ND
Iso-1: Digikey P/N=296-ISO1640QDWRQ1CT-ND
Iso-2: Digikey P/N=296-ISO6761QDWRQ1CT-ND
J1-1 J1-2 J1-3: Digikey P/M="609-3461-ND, S9000-ND"
L_Blue L_RGB1 L_RGB_2: Digikey P/N=1497-1079-5-ND
L_Green: Digikey P/N=1497-1082-5-ND
L_Yellow: Digikey P/N=1497-XGMYKX10D-ND
LL-1_SWP1 LL-1_SWP2 LL-1_SWP3 LL-1_SWP4 LL-1_SWP5 LL-1_SWP6 LL-1_SWP7 LL-2 LL-3 LL-4 LL-5 LL-6: Digikey P/N="67-1083-ND, 67-1084-ND, 67-1082-ND"
LR-1 LR-2 LR-3: Digikey P/N=1175-1489-ND
Mux1 Mux2: Digikey P/N=505-ADG707BRUZ-ND
N1: Digikey P/N=296-11607-1-ND
Opa1-1 Opa1-2 Opa1-3 Opa1-4 Opa1-5: Digikey P/N=MCP6002T-I/MSCT-ND
Opa2-1 Opa2-2 Opa2-3 Opa2-4 Opa2-5 Opa2-6 Opa2-7 Opa2-8: Digikey P/N=296-OPA388QDBVRQ1CT-ND
OpAmp-1: Digikey P/N=505-ADUM3195WBRQZ-ND
RF_Mag_1 RF_Mag_2 RF_Mag_3 RF_Mag_4: Digikey P/N=505-AD8318ACPZ-REEL7CT-ND
RF_PM_1 RF_PM_2: Digikey P/N=505-AD8302ARUZ-REELCT-ND
RFF-1 RFF-2 RFF-3 RFF-4: Digikey P/N=478-BP2816A0480SNTR\50CT-ND
RFS1: Digikey P/N=2057-RF2-04A-T-00-50-G-ND
RFS-1 RFS-2 RFS-3 RFS-4: Digikey P/N=408-2051-1-ND
Sw1: Digikey P/N=296-53597-1-ND
SWP1_SWP1 SWP1_SWP2 SWP1_SWP3 SWP1_SWP4 SWP1_SWP5 SWP1_SWP6 SWP1_SWP7: Digikey P/N=448-BTF3035EJXUMA1CT-ND
VReg-1: Digikey P/N=945-1730-5-ND
VReg-2 VReg-3: Digikey P/N=ADM7150ARDZ-5.0-R7CT-ND
VReg-4: Digikey P/N=505-ADM7150ARDZ-3.3-R7CT-ND
VReg-5: Digikey P/N=ADP7118ARDZ-3.3-R7CT-ND
VReg-6 VReg-7: Digikey P/N=ADP7118ARDZ-5.0-R7CT-ND
VReg-8: Digikey P/N=945-1820-5-ND

## Free pads (board coordinates)
  round 0 hole 1.75 unplated paste+0: 0(29.375,1.75) 0(39.325,1.75)
  round 6 hole 3 unplated paste+0: 2(140,175) 3(5,175) 4(14.2,100) 4(51,4) 4(79.5,136) 5(117.9,32)

## Via types
v1: diameter 0.6, hole 0.3, Top Layer to Bottom Layer, tented both sides, 1967 vias
v2: diameter 0.5, hole 0.25, Top Layer to Bottom Layer, tented both sides, 1025 vias
v3: diameter 0.9, hole 0.5, Top Layer to Bottom Layer, tented both sides, 8 vias

## Nets (pads, with @x,y where several pads share a name; then routed paths per layer and width w, separated by ;. In a path a pad name is that pad's centre, name@x,y a point inside that pad or via, vN(x,y) a via of type N, cw(c..) or ccw(c..) an arc to the next point about the centre after c; other vN are vias at no path point)
1V1: Opa1-1.3 R1-4.1 R1-5.2 | length 7.6
  Top Layer w0.3: R1-4.1@46.7,92.6 R1-5.2@48.3,92.6 48.6,92.9 49.2,92.9 49.6,93.3 49.6,93.9 50.1,94.4 51.7,94.4 52,94.1 Opa1-1.3@52,93
1V8: J1-3.1 LR-1.6 LR-2.6 LR-3.6 Opa1-3.1 Opa1-3.2 | length 89.3
  Top Layer w0.254: LR-1.6@5.2,123.48 6.82,123.48 8.1,122.2 8.1,106.95 9.7,105.35 14.95,105.35 20,110.4 v1(20,110.85) ; v1(18.05,119.7) 18.05,119.794 17.898,119.946 17.898,120.802 Opa1-3.2@17.8,120.9 Opa1-3.1@18.45,120.9 ; J1-3.1@35.65,129.84 34.3,128.49 34.3,126.25 34.55,126 36.2,126 38.499,123.701 39.459,123.701 LR-3.6@39.68,123.48
  Bottom Layer w0.254: v1(20,110.85) 20,117.75 v1(18.05,119.7) 18.05,123.15 19.65,124.75 20.9,124.75 ; LR-2.6@25,123.46 24.76,123.7 24.2,123.7 24.2,123.75 23.2,124.75 20.9,124.75 ; J1-3.1@35.65,129.84 28.99,129.84 28.65,129.5 28.65,128.8 28.15,128.3 26.95,128.3 26.35,128.9 26.35,129.55 26.05,129.85 21.45,129.85 20.9,129.3 20.9,124.75
1V25: LR-4.4 LR-5.4 Opa1-4.5 Opa1-5.6 Opa1-5.7 R1-20.2 | length 80.2
  Top Layer w0.254: LR-4.4@14.94,134.12 16.46,132.6 19.5,132.6 19.75,132.35 19.75,130.55 19.398,130.198 18.648,130.198 18.55,130.1 Opa1-4.5@18.55,129.6 18.55,128.15 20.2,126.5 v1(20.2,123.8) ; v1(35.65,111.15) Opa1-5.6@35.65,109.7 Opa1-5.7@36.3,109.7
  Bottom Layer w0.254: LR-4.4@14.94,134.12 16.2,135.38 16.2,137.65 17.3,138.75 36.15,138.75 37.939,140.539 37.939,141.499 LR-5.4@38.16,141.72 ; v1(19.8,121.95) 19.9,121.85 20.75,121.85 ; v1(20.2,123.8) 20.75,123.25 20.75,121.85 ; v1(35.65,111.15) 33.95,109.45 33.7,109.45 31.25,107 21.65,107 20.75,107.9 20.75,121.85
2V5: J1-3.3 Opa1-5.1 Opa1-5.2 | length 12.9
  Top Layer w0.254: J1-3.3@35.65,124.76 37.95,122.46 v1(37.95,117.25) ; Opa1-5.2@36.3,114.1 Opa1-5.1@36.95,114.1 36.9,114.15 36.9,115.206 36.7,115.406 v1(36.7,115.5)
  Bottom Layer w0.254: v1(36.7,115.5) 36.7,116 v1(37.95,117.25)
2V5_Offset: Opa2-4.1 Opa2-4.4 R12-10.1 RD-1.2 RD-2.2 RD-3.2 RD-5.2 RD-6.2 | length 65.8
  Top Layer w0.2: Opa2-4.4@76,39.55 75.275,39.55 75.1,39.725 75.1,39.884 74.2,40.784 74.2,42.9 75.5,44.2 78.5,44.2 79.2,44.9 79.2,48
  Top Layer w0.3: RD-3.2@60.35,30.9 60.35,30.8 60.6,30.55 63.75,30.55 ; v1(63.8,35.3) 63.75,35.25 63.75,30.55 ; v1(65.05,30.55) 63.75,30.55 ; RD-2.2@68.65,30.1 v1(69.3,30.1) ; RD-1.2@72.65,28.7 72.65,29.05 72.9,29.3 73.174,29.3 73.35,29.476 v1(73.35,29.95) ; v1(74.5,34.3) 74.3,34.5 74.3,38.6 75.125,39.425 75.875,39.425 Opa2-4.4@76,39.55 76.656,39.55 76.781,39.425 76.781,39.019 78.066,37.734 79.666,37.734 Opa2-4.1@79.75,37.65 ; R12-10.1@78.9,53.15 79.2,52.85 79.2,48
  Bottom Layer w0.3: v1(56.9,39.3) 58.7,39.3 59.5,38.5 ; v1(60.6,39.6) 59.5,38.5 ; v1(63.8,35.3) 62.7,35.3 59.5,38.5 ; v1@65.1,30.55 65.55,30.1 v1(69.3,30.1) 74.324,30.1 74.5,30.276 v1(74.5,34.3)
3V3_Fluxgate: C6-16.2 C6-17.2 CF-5.2 VReg-4.2 | length 139.6
  Top Layer w0.4: CF-5.2@46.825,14.225 46.825,14.875
  Top Layer w0.5: 46.825,14.875 46.825,19.925 50,23.1 50,25.8 v1(50.8,26.6) v1(50.8,27.3) v1(50.8,28) ; v1(51.5,32.8) 51.5,32.827 51.2,33.127 v1(51.2,33.6) v1(51.2,34.3) 51.2,52.1 57.5,58.4 57.5,63.2 59.3,65 60.6,65 66.9,71.3 69,71.3 71.8,74.1 71.8,75.1
  Top Layer w0.6: 88.8,104.7 88.8,104.6 89.754,103.646 VReg-4.2@91.368,103.646
  Top Layer w1: 71.8,74.1 71.9,74.2 v1(71.9,106.1) v1(71.9,107) v1(71.9,107.9) ; v1(80.175,105.9) v1(79.2,105.9) 79.225,105.875 v1@81.2,105.875 ; v1(81.2,105.9) v1@81.2,105.875 ; 88.8,104.7 88.8,105.875 ; C6-16.2@91.767,107.05 C6-17.2@89.1,107.05 88.8,107.05 88.8,105.875 ; v1@81.2,105.875 88.8,105.875
  Bottom Layer w0.5: v1(50.8,26.6) 50.8,26.627 50.9,26.727 v1@50.9,27.3 ; v1(50.8,27.3) v1(50.8,28) 50.8,32.1 v1(51.5,32.8) 51.5,33.3 v1(51.2,33.6)
  Bottom Layer w1: v1@71.9,105.9 v1(79.2,105.9) ; v1(71.9,106.1) v1(71.9,107) v1(71.9,107.9) ; v1@79.4,105.9 v1(80.175,105.9) v1(81.2,105.9)
3V3_Fluxgate_Con: CF-5.1 Con_S.3 | length 16.6
  Top Layer w0.2: Con_S.3@36.1,3.6 36.1,4.8 36.7,5.4 36.75,5.4
  Top Layer w0.4: 36.7,5.4 37.575,6.275 37.575,6.725 40.25,9.4 ; CF-5.1@46.825,13.075 46.825,12.525 46.85,12.5
  Top Layer w0.5: 40.25,9.4 44.65,9.4
  Top Layer w0.6: 44.65,9.4 46.85,11.6 46.85,12.5
3V3_IN: C1-1.1 C1-3.1 C2-1.1 H1.6 Iso-1.3 Iso-2.1 | length 41.9
  Top Layer w0.3: Iso-2.1@28.96,166.7 28.96,166.85 29.11,167 C1-1.1@31.42,167 31.25,167.17 v1(31.25,167.7) ; v1(40.05,168.95) 40.1,169 C1-3.1@40.42,169 40.19,168.77 Iso-1.3@40.19,166.7 ; C2-1.1@45.4,170.08 v1(45.4,170.85)
  Bottom Layer w0.3: v1(31.25,167.7) 37.2,167.7 38.45,168.95 v1(40.05,168.95) 43.5,168.95 v1(45.4,170.85) 45.55,171 45.55,176.3 44.6,177.25 34.45,177.25 H1.6@32.7,175.5